# Altium PCB IoT_SYNTHPATCH.PcbDoc (part 1 of 3)
Units mm, origin at the board's own origin, x right, y up, seen from the top; angles counter-clockwise.
Board outline 109 x 108 mm, 6 copper layers (Top Layer, PWR, GND, SIG_MID, GND2, Bottom Layer), stack 1.82 mm thick; 198 components, 158 nets, 695 pads, 418 vias.
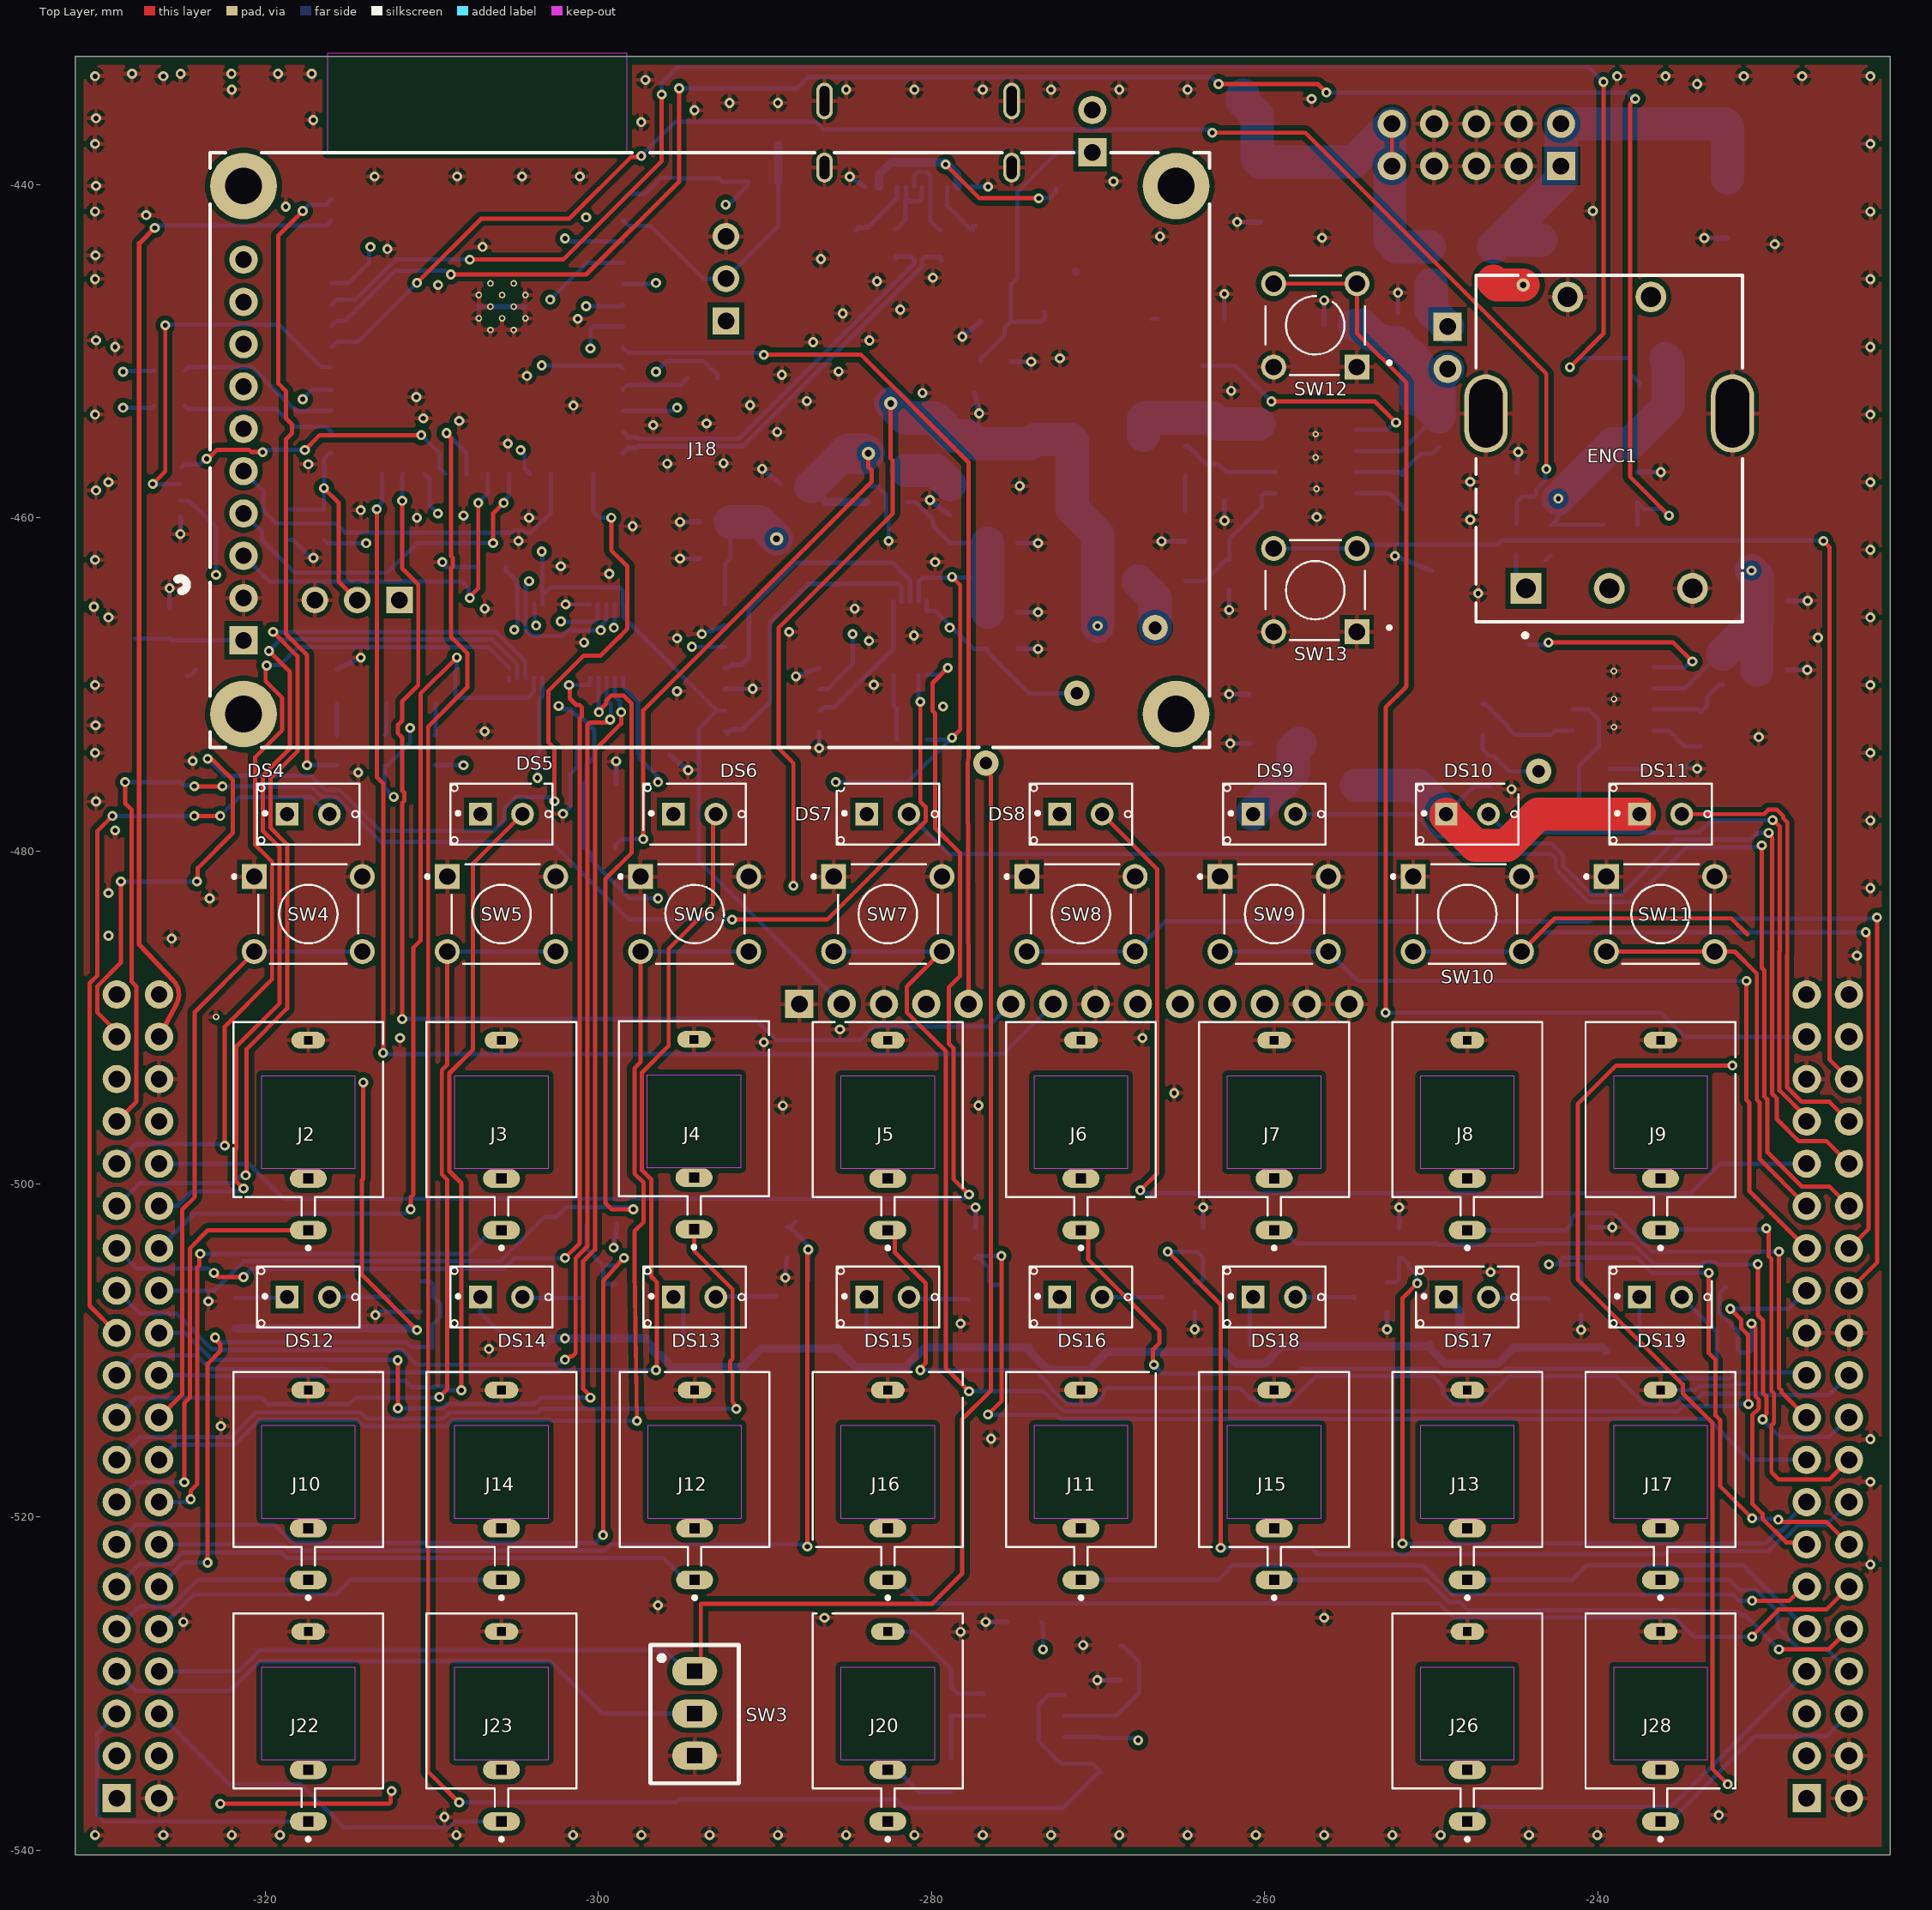
[diagram p0: Top Layer view]
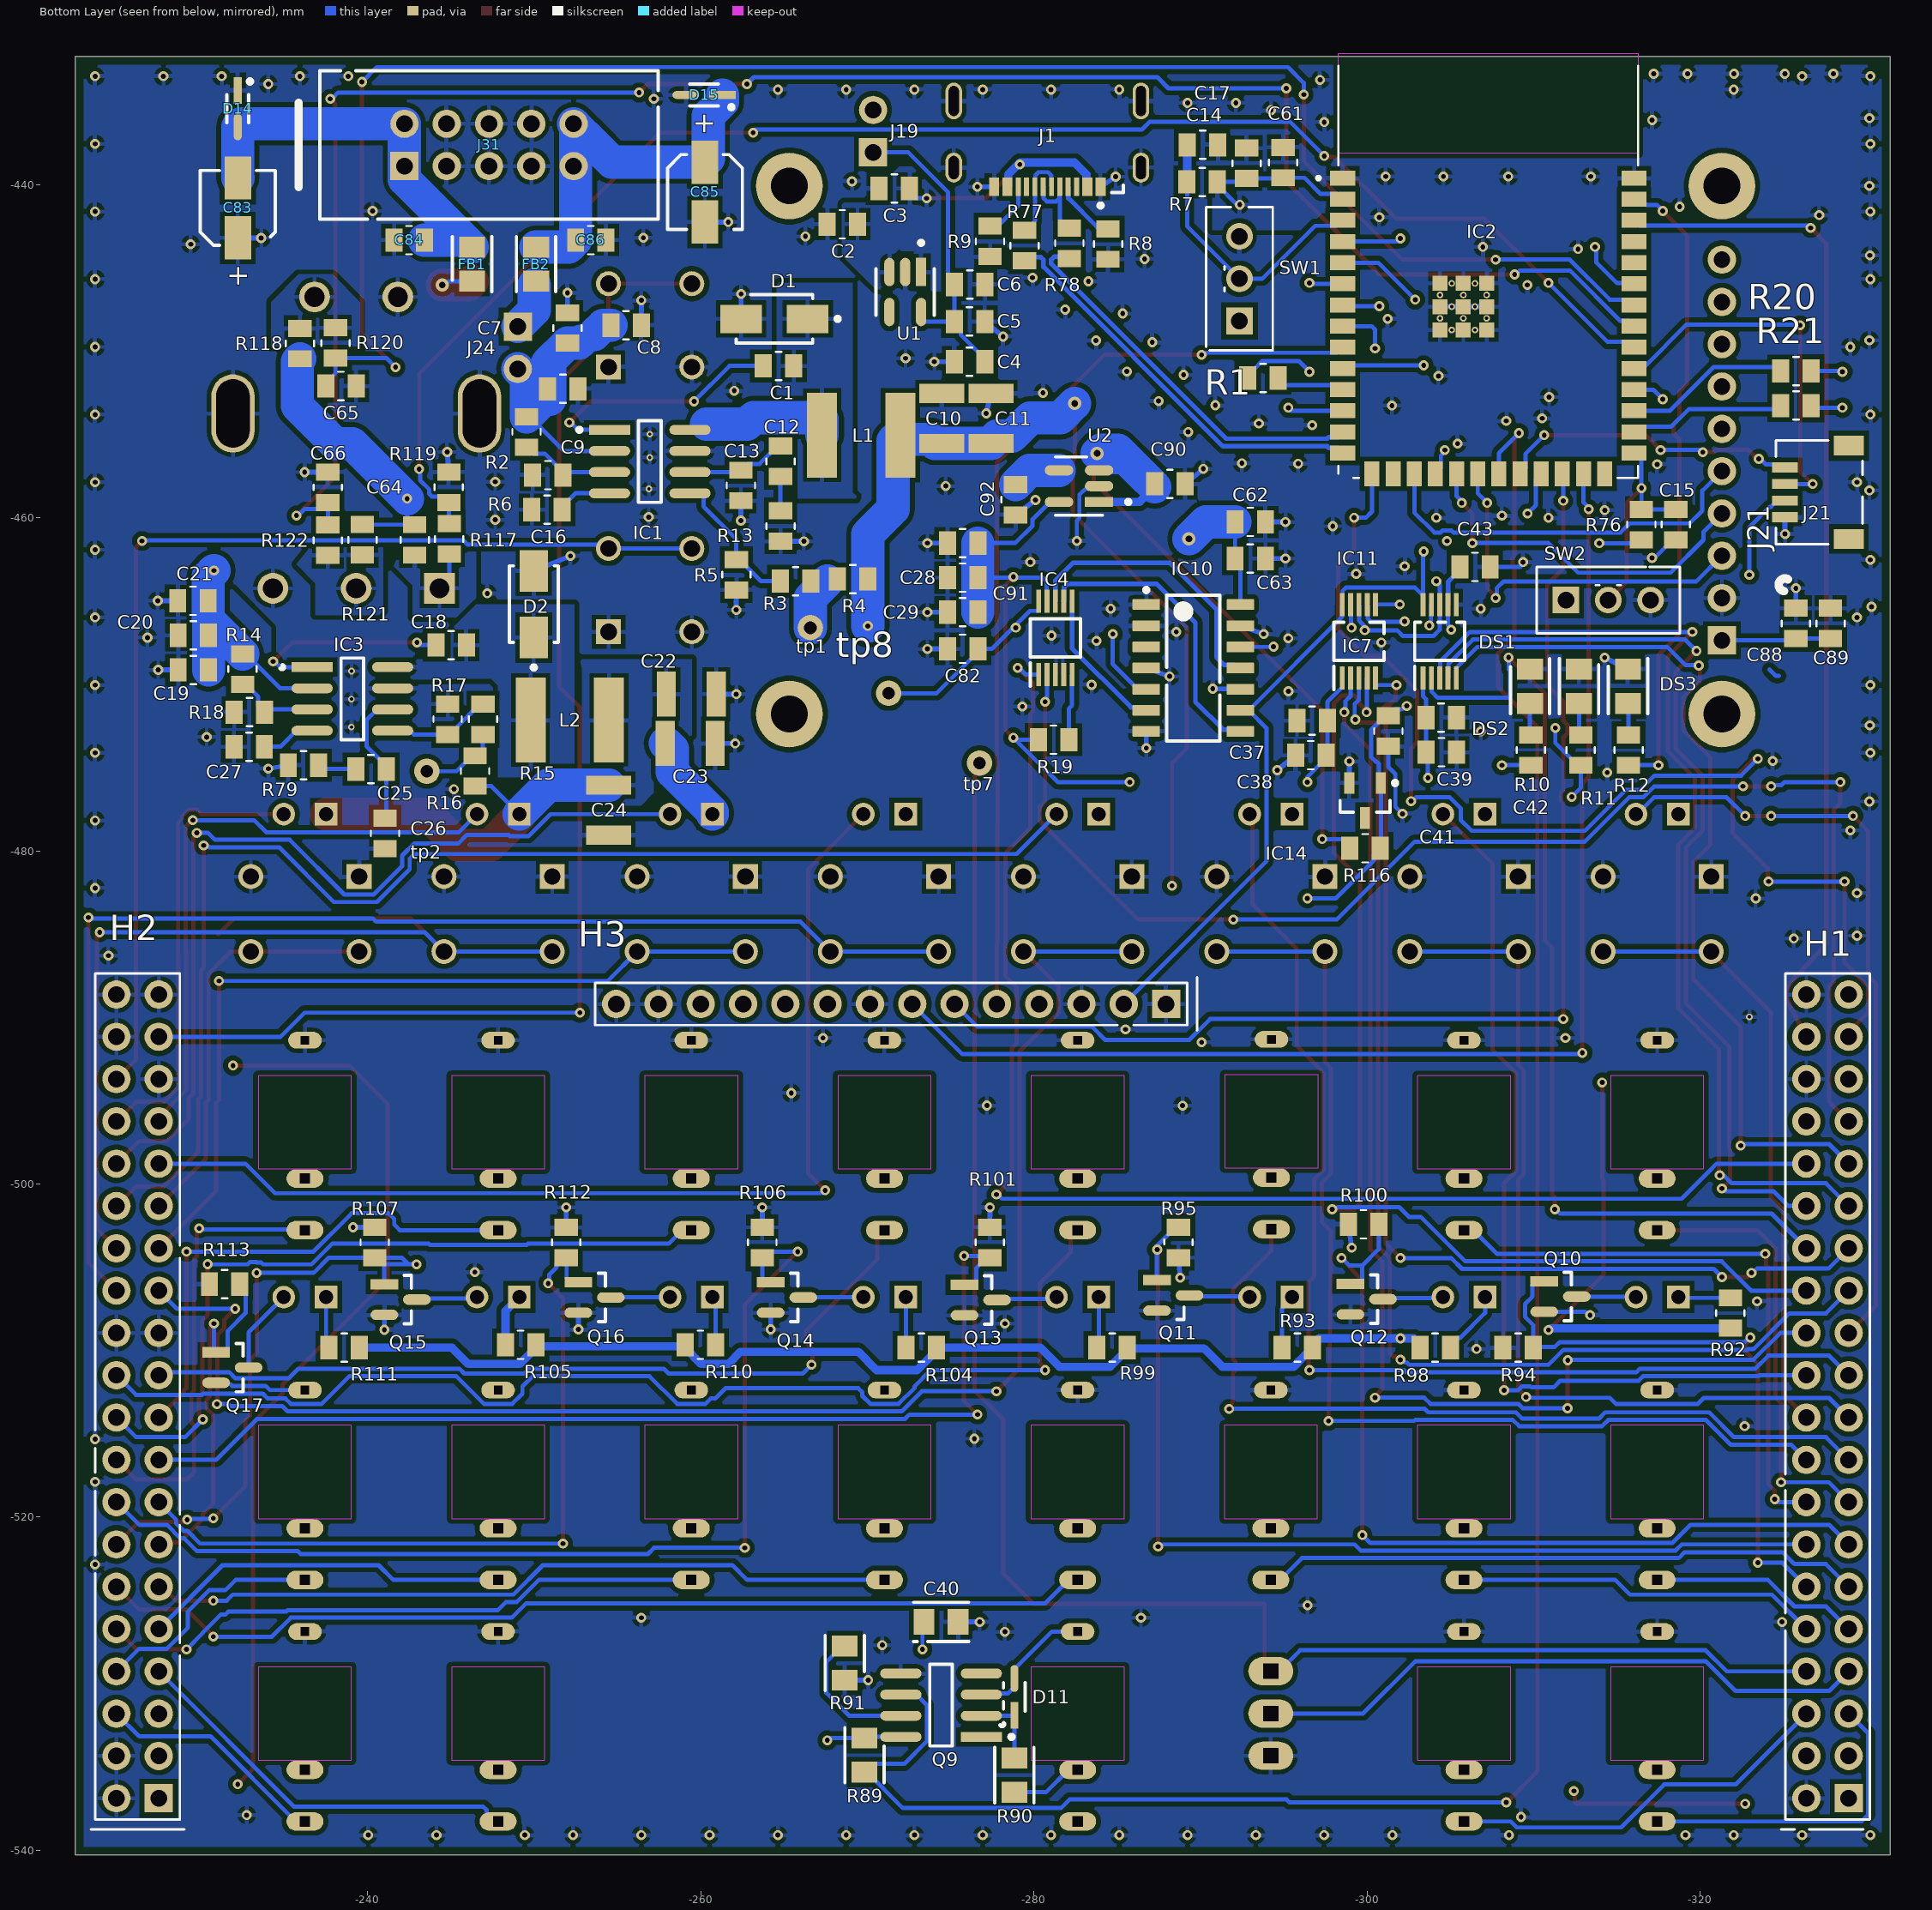
[diagram p1: Bottom Layer view, seen from below]
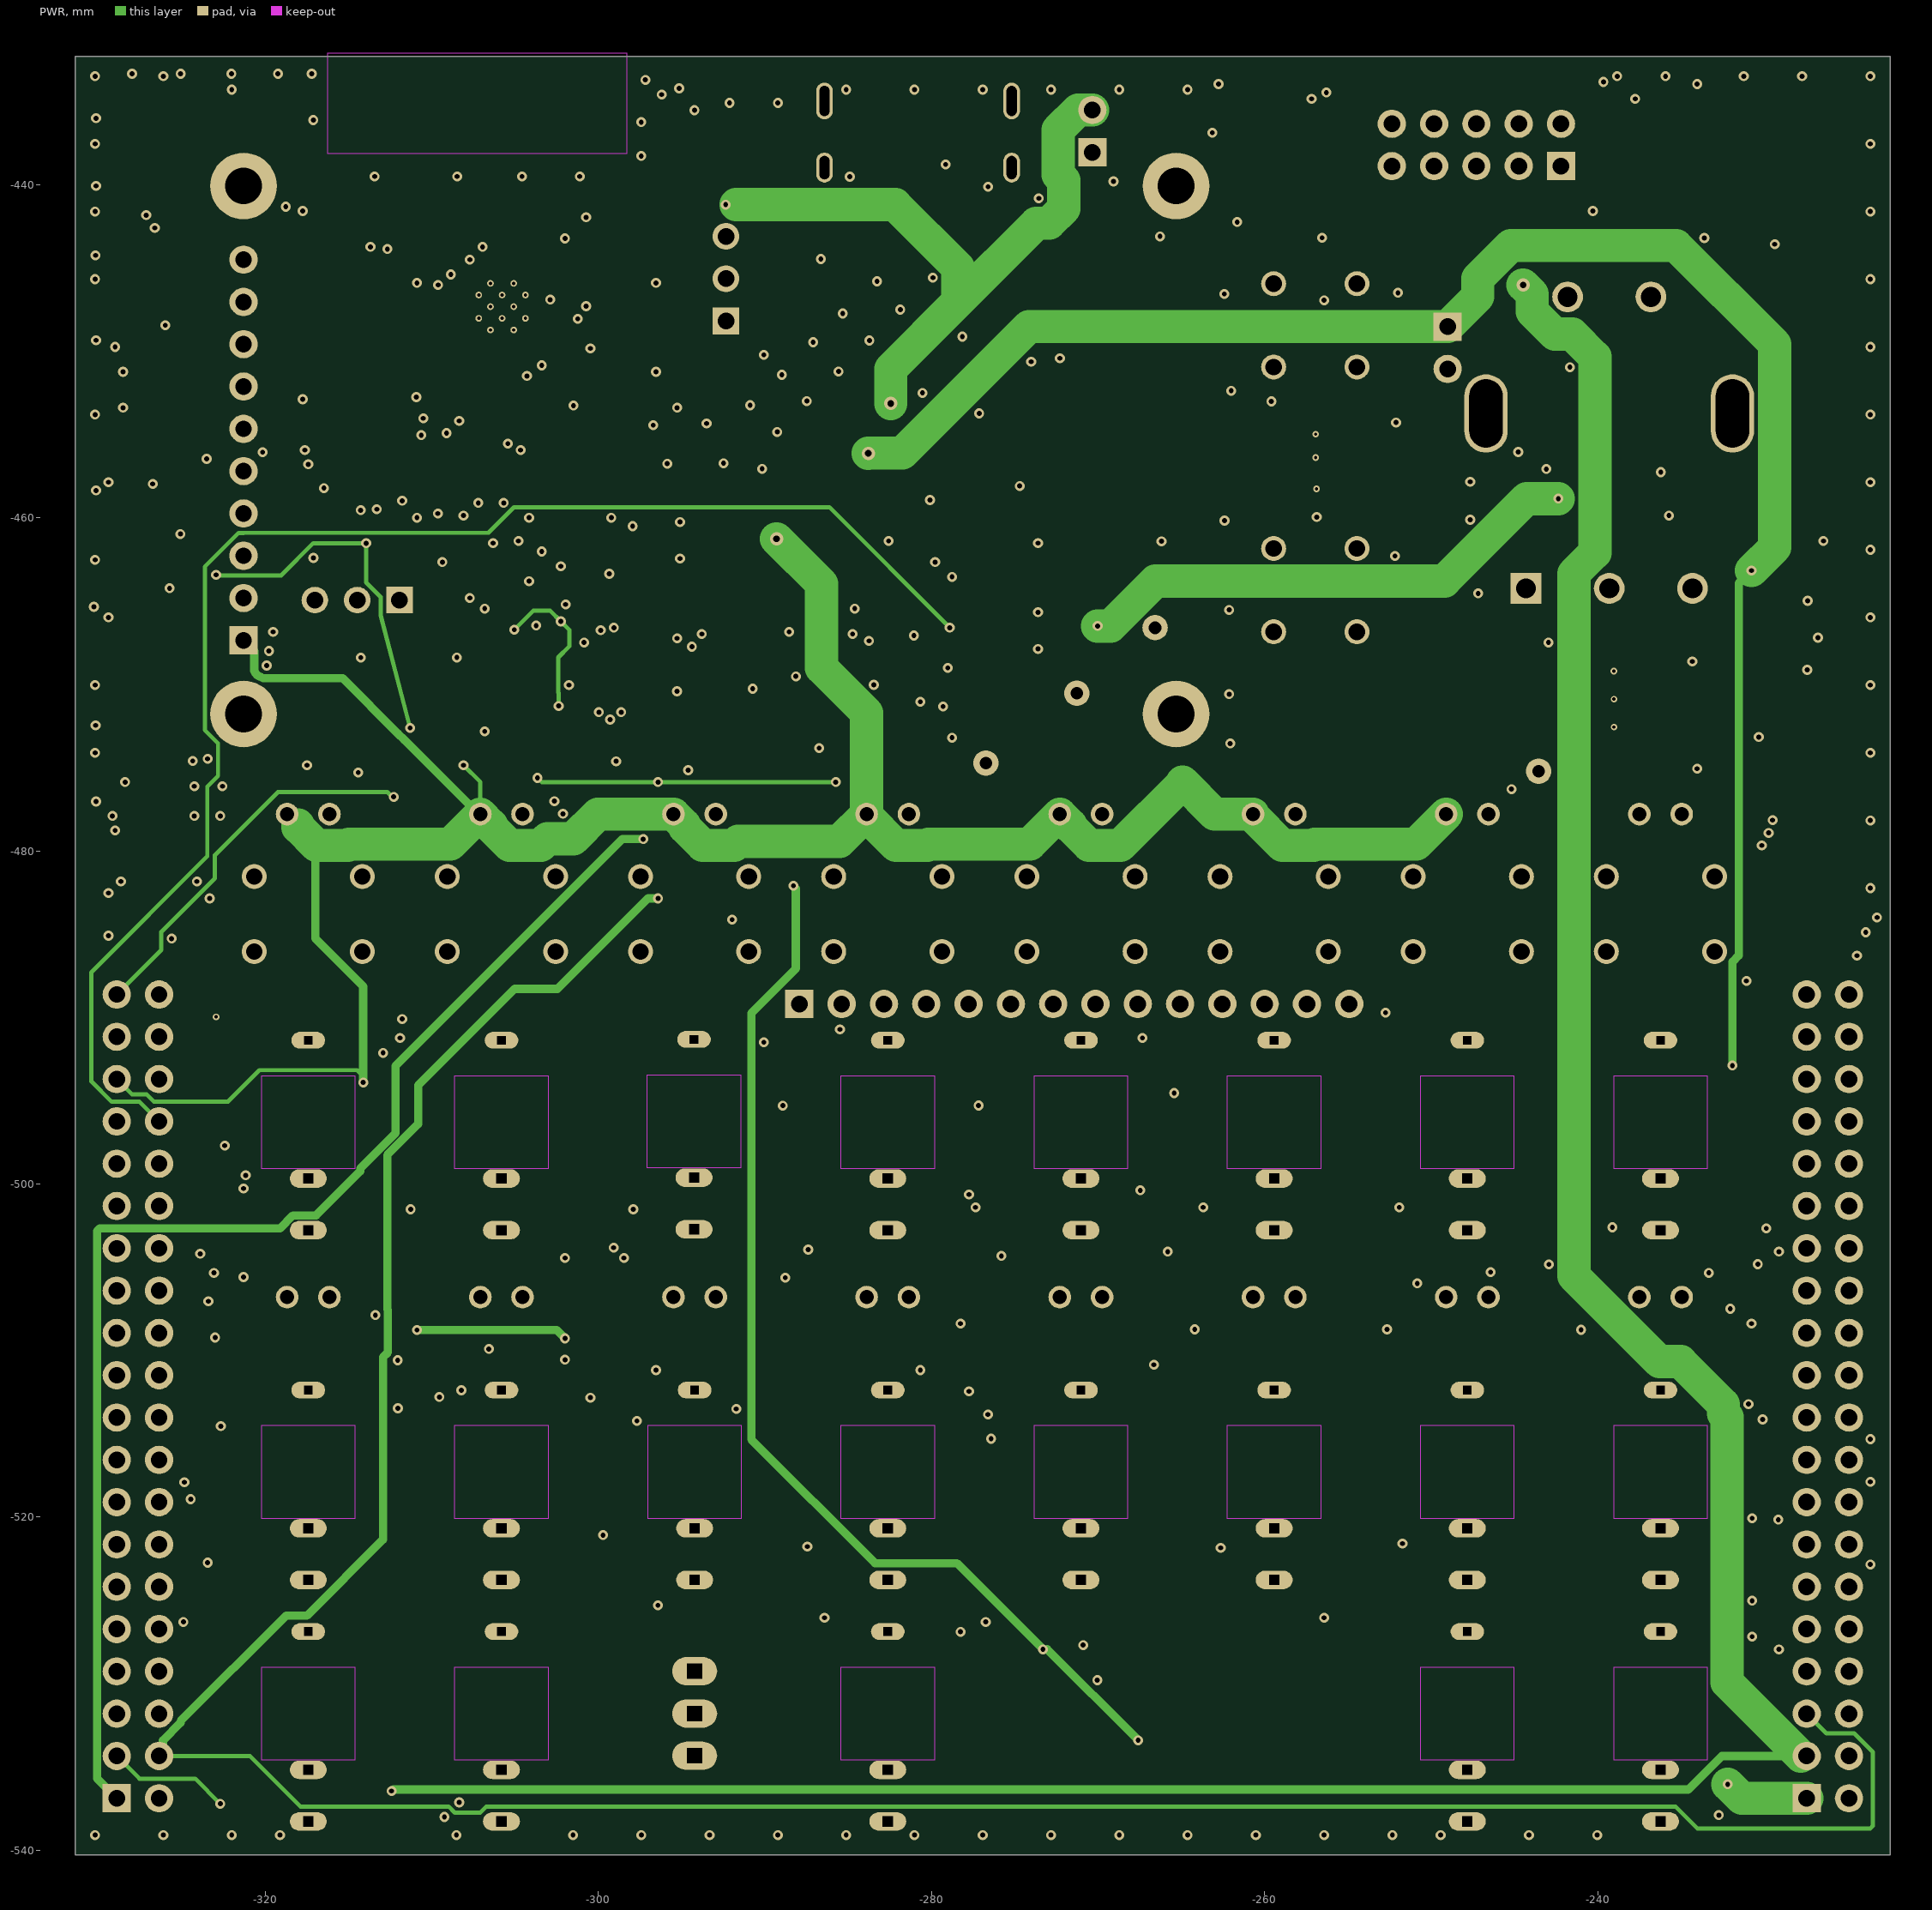
[diagram p2: PWR]
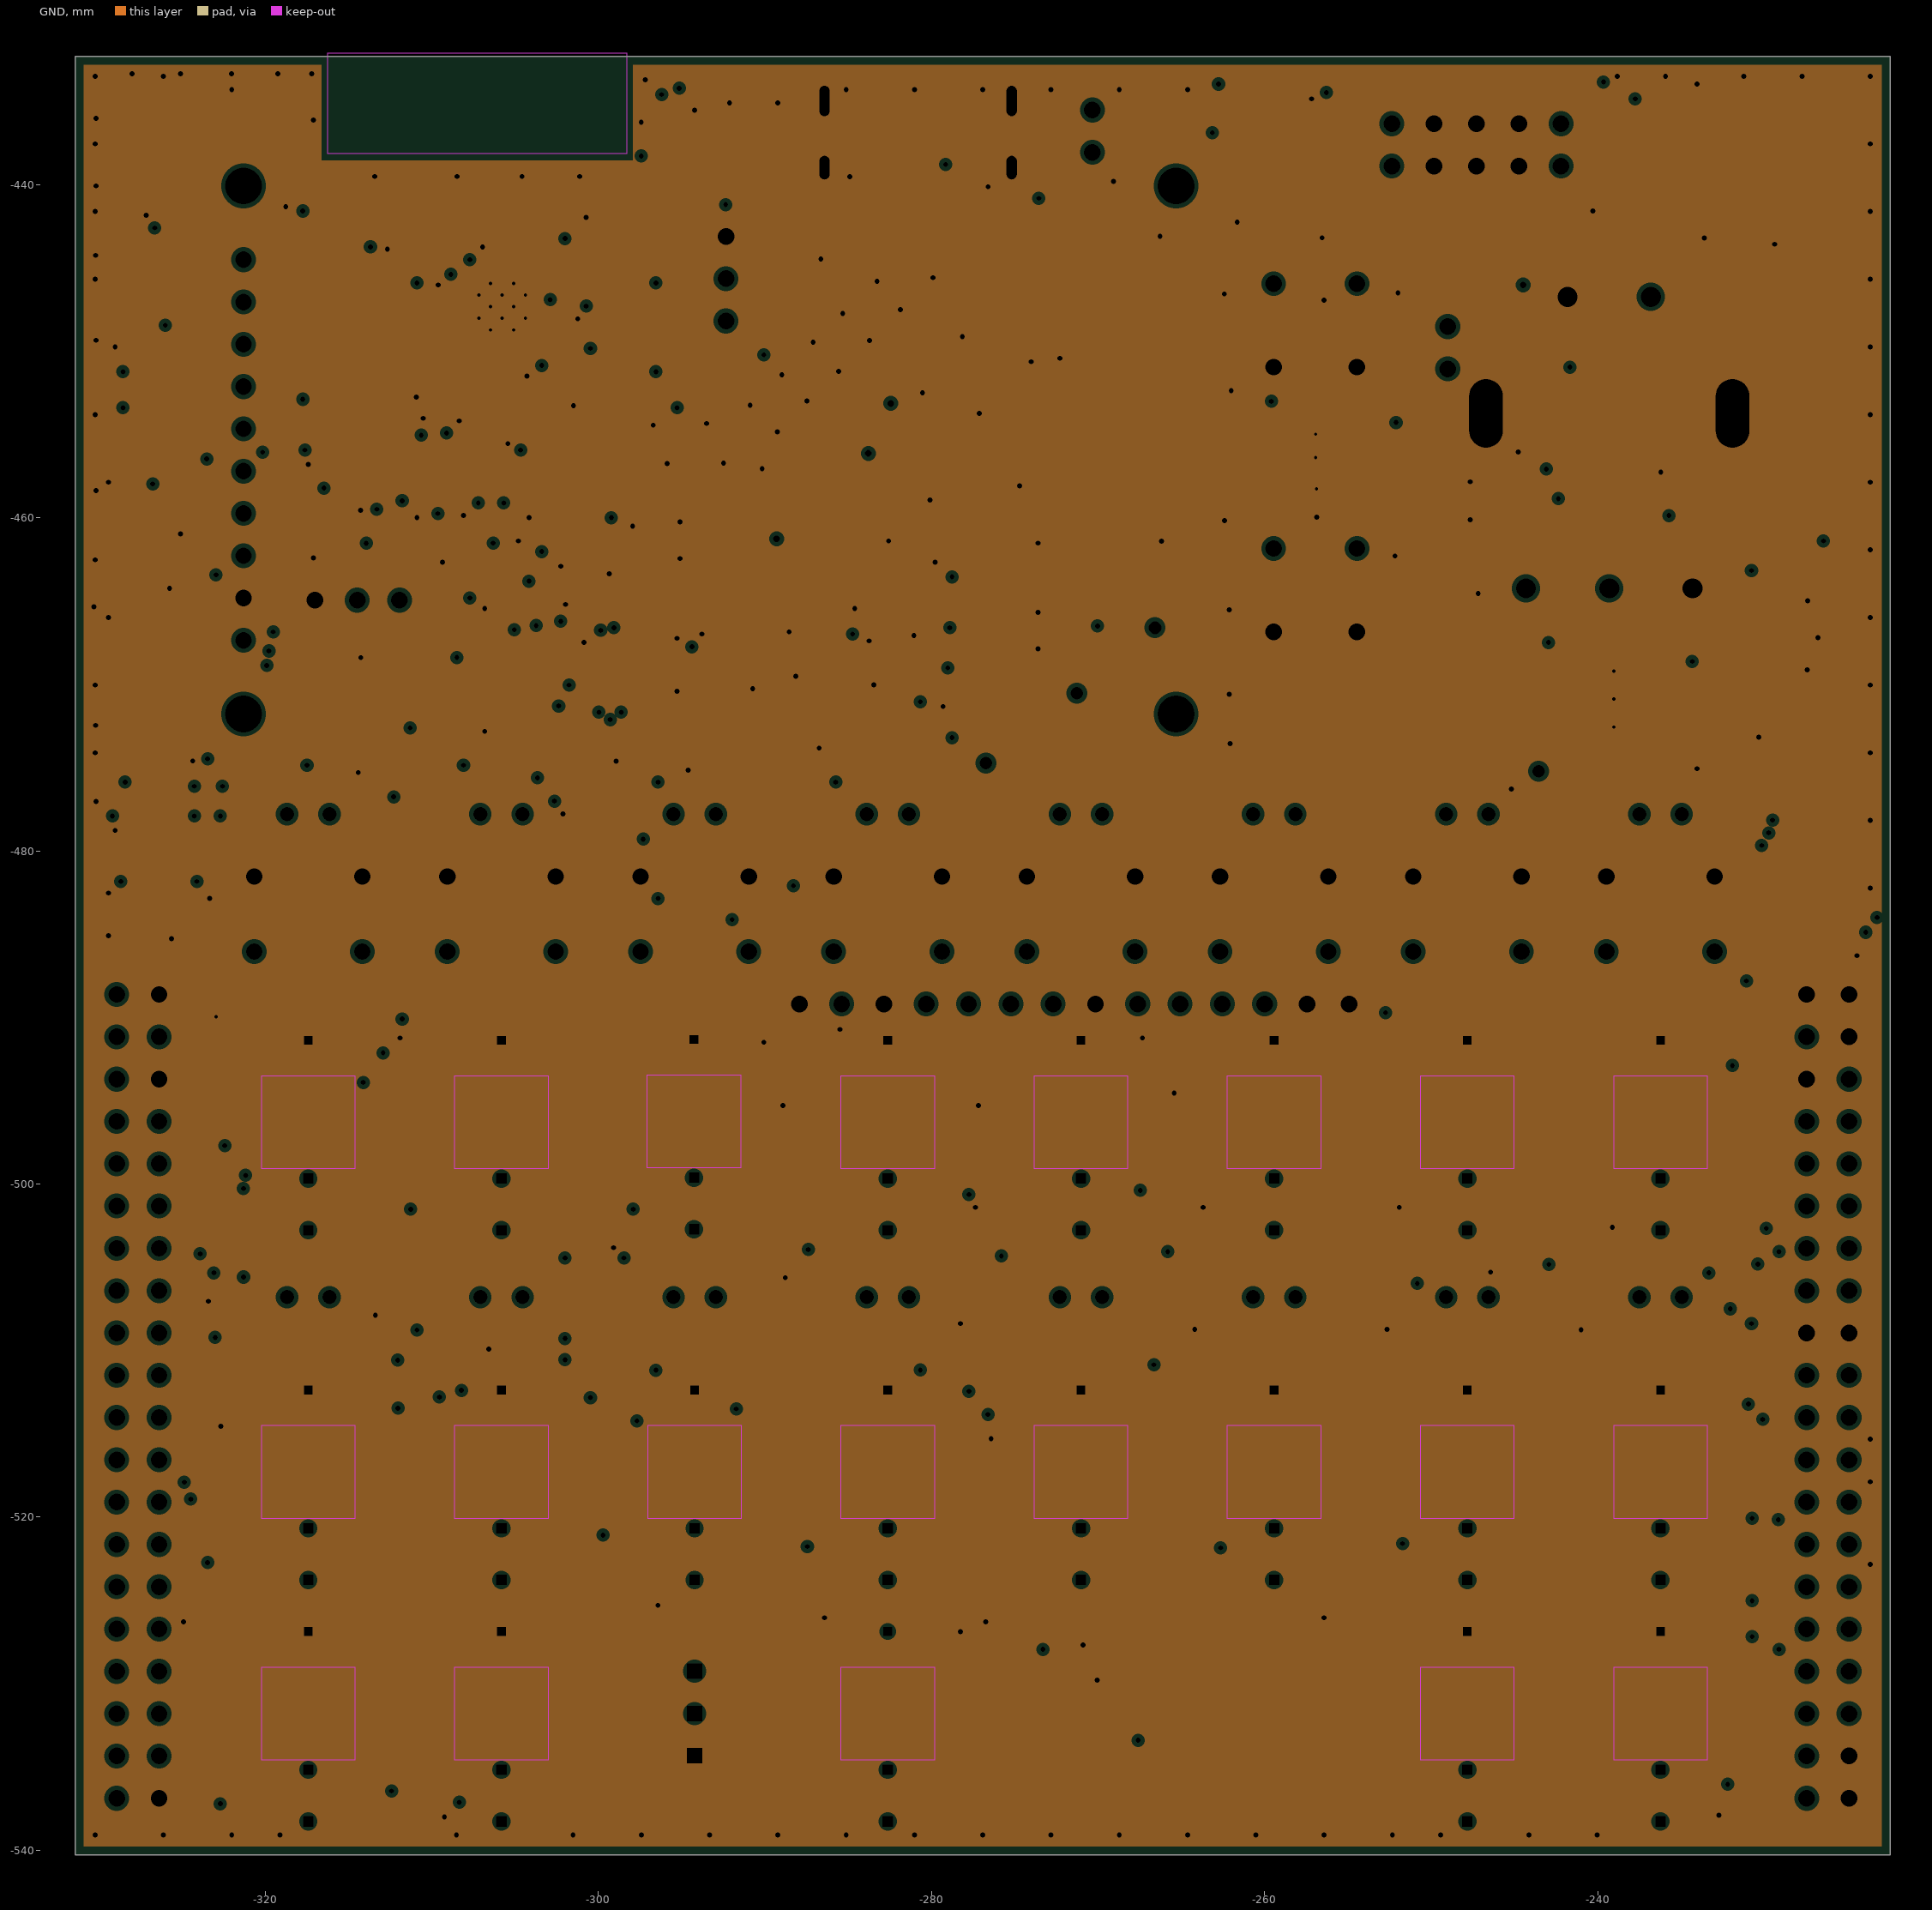
[diagram p3: GND, clearances drawn from the general rule]
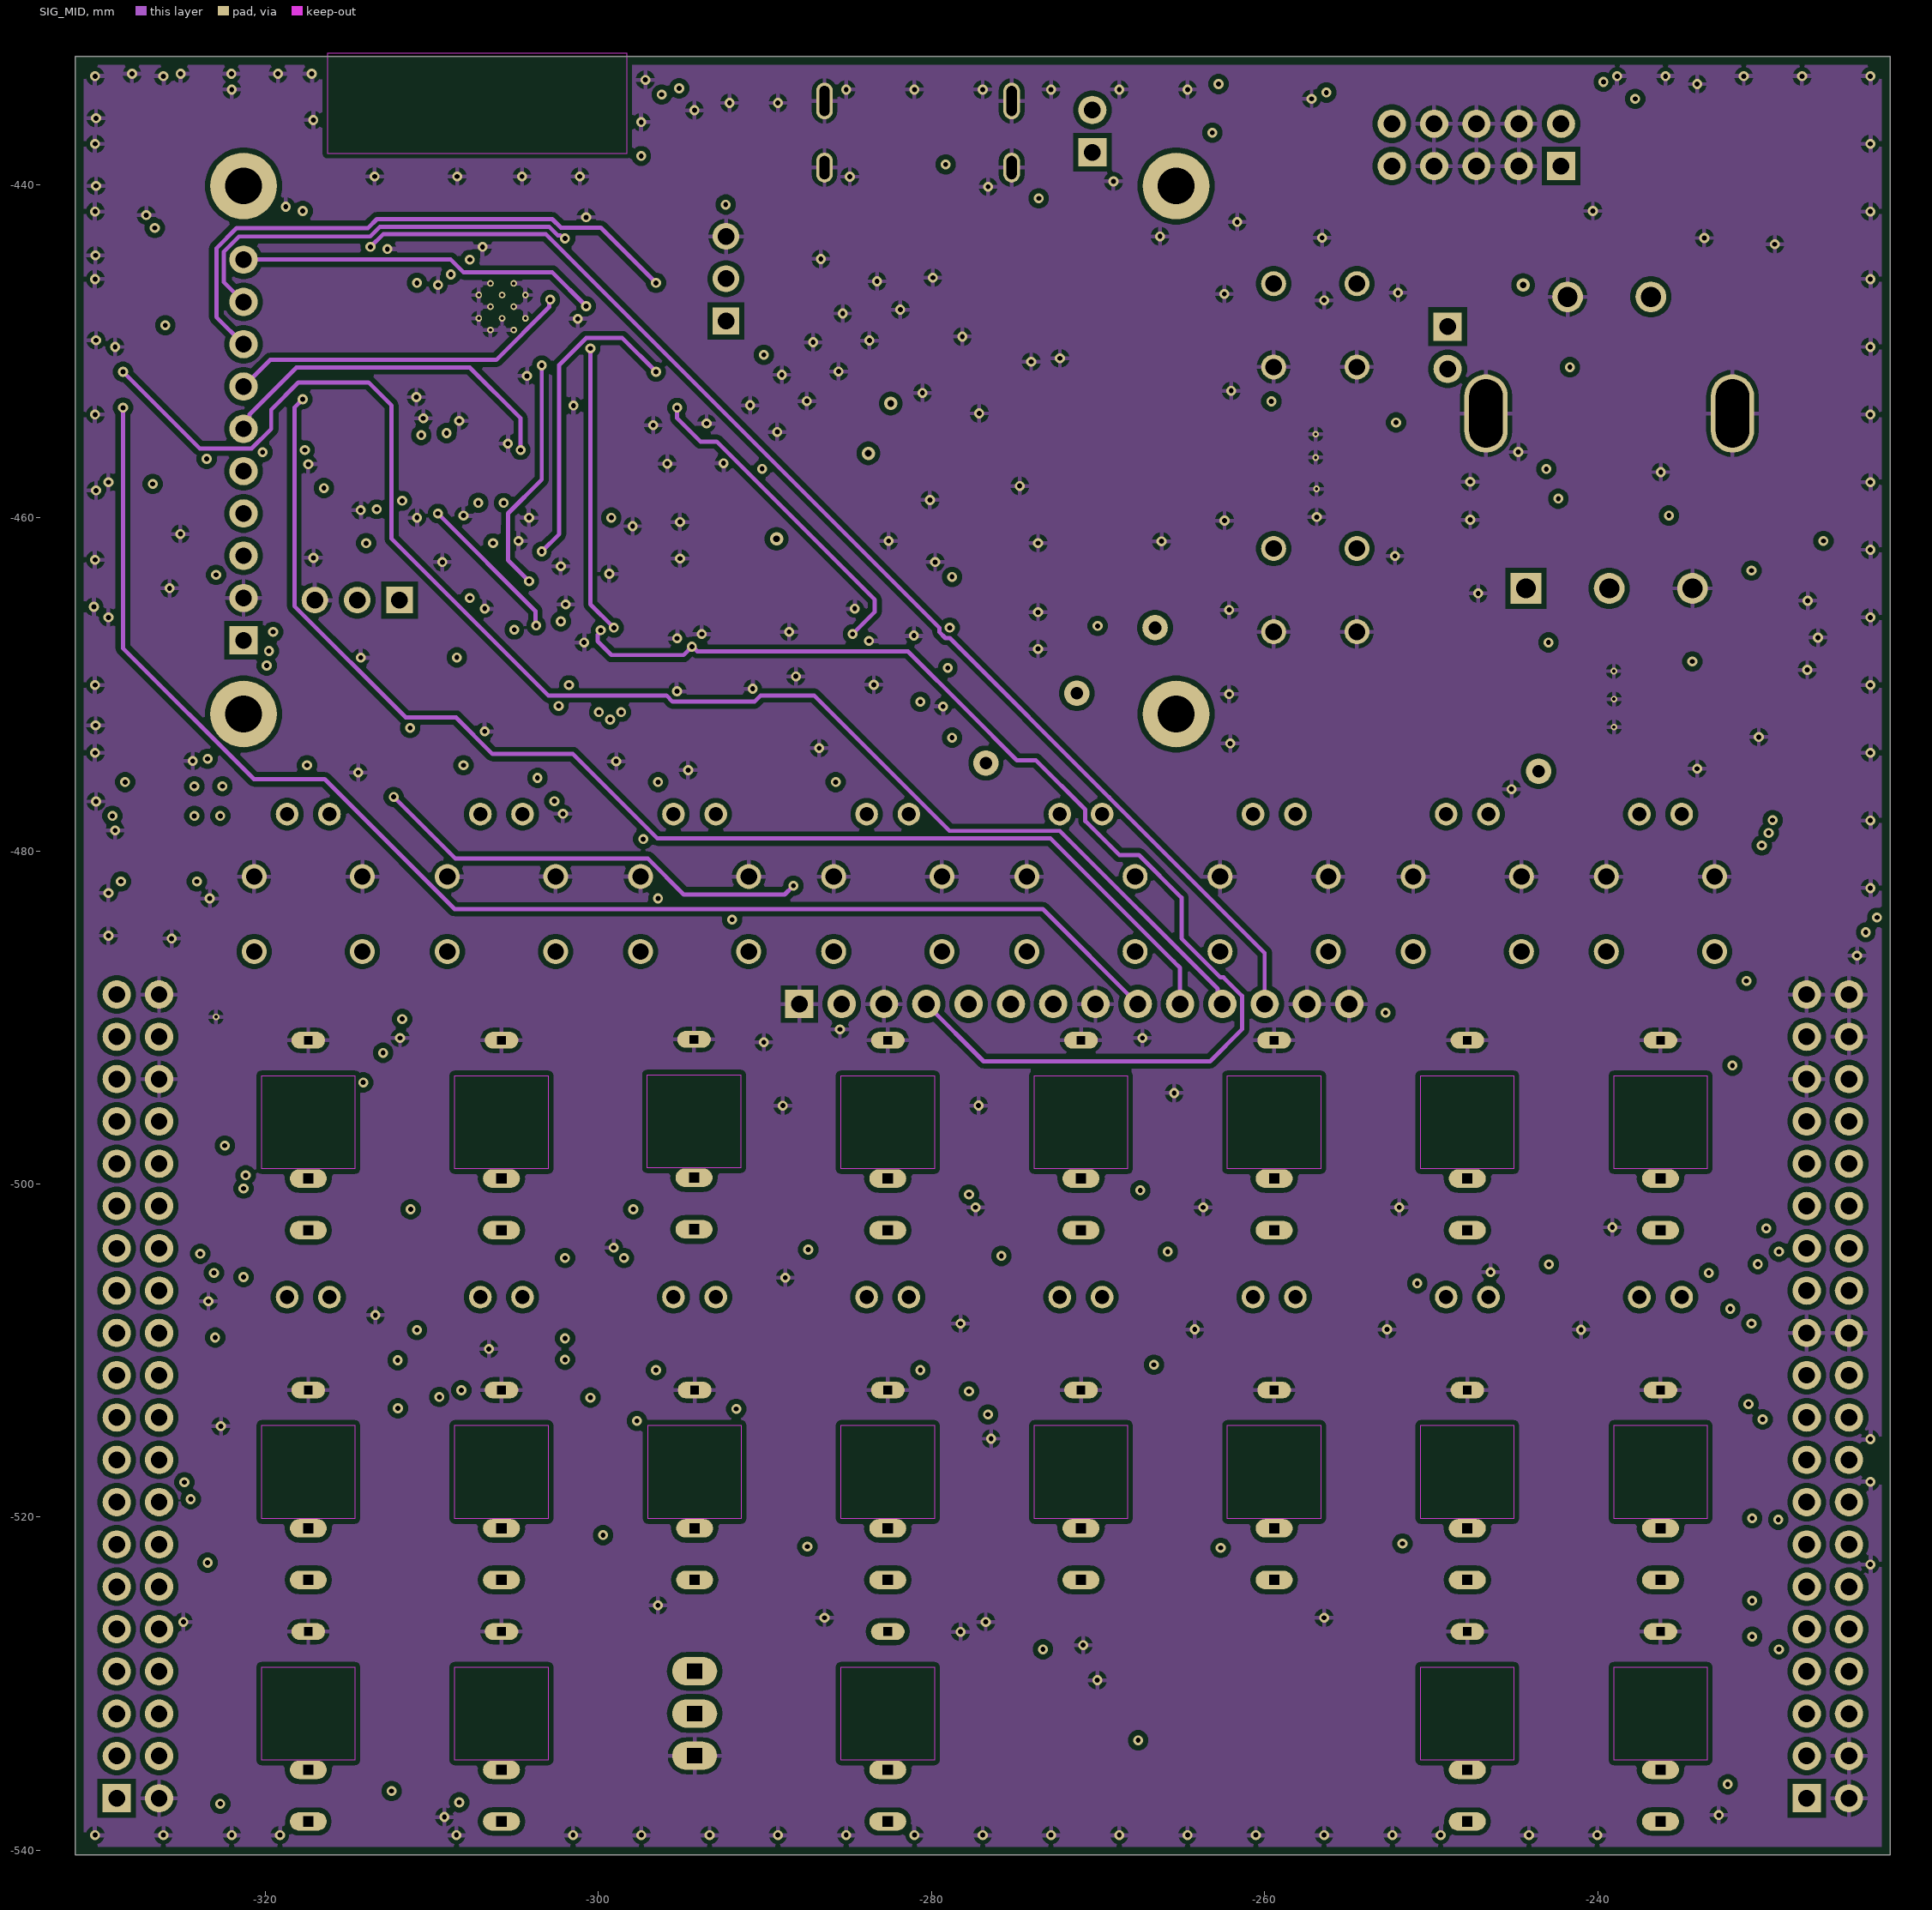
[diagram p4: SIG_MID]
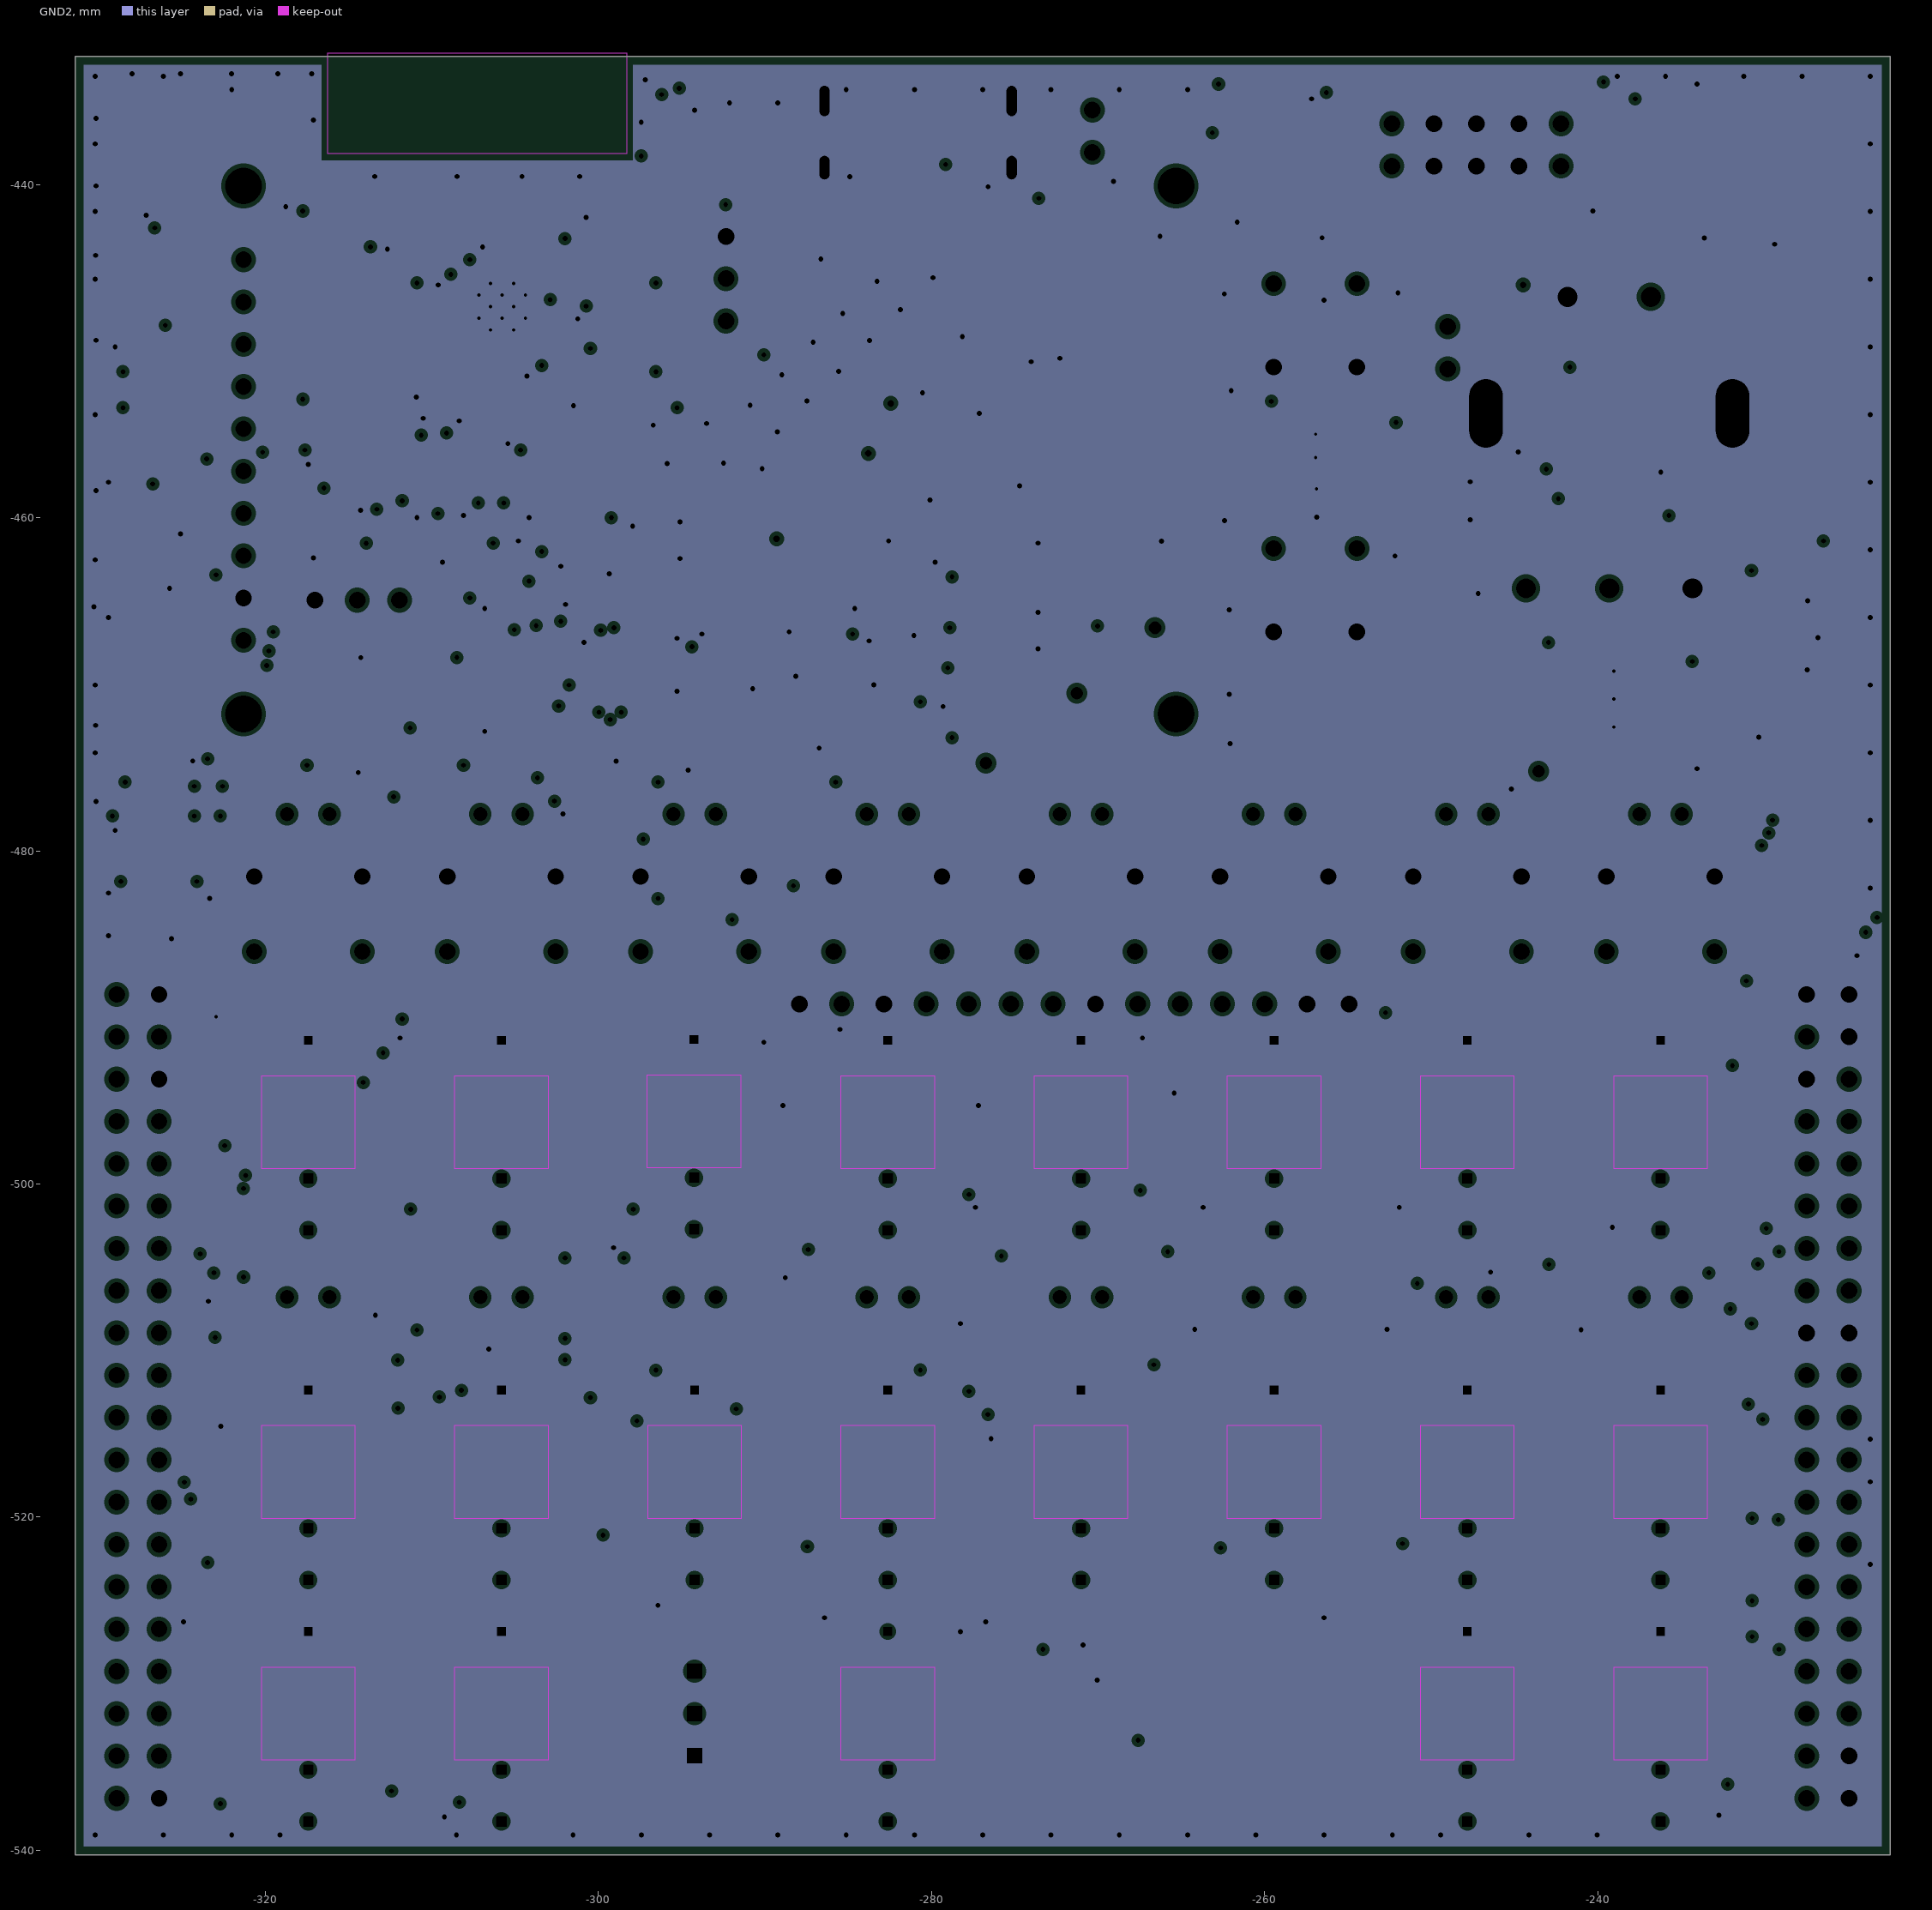
[diagram p5: GND2, clearances drawn from the general rule]
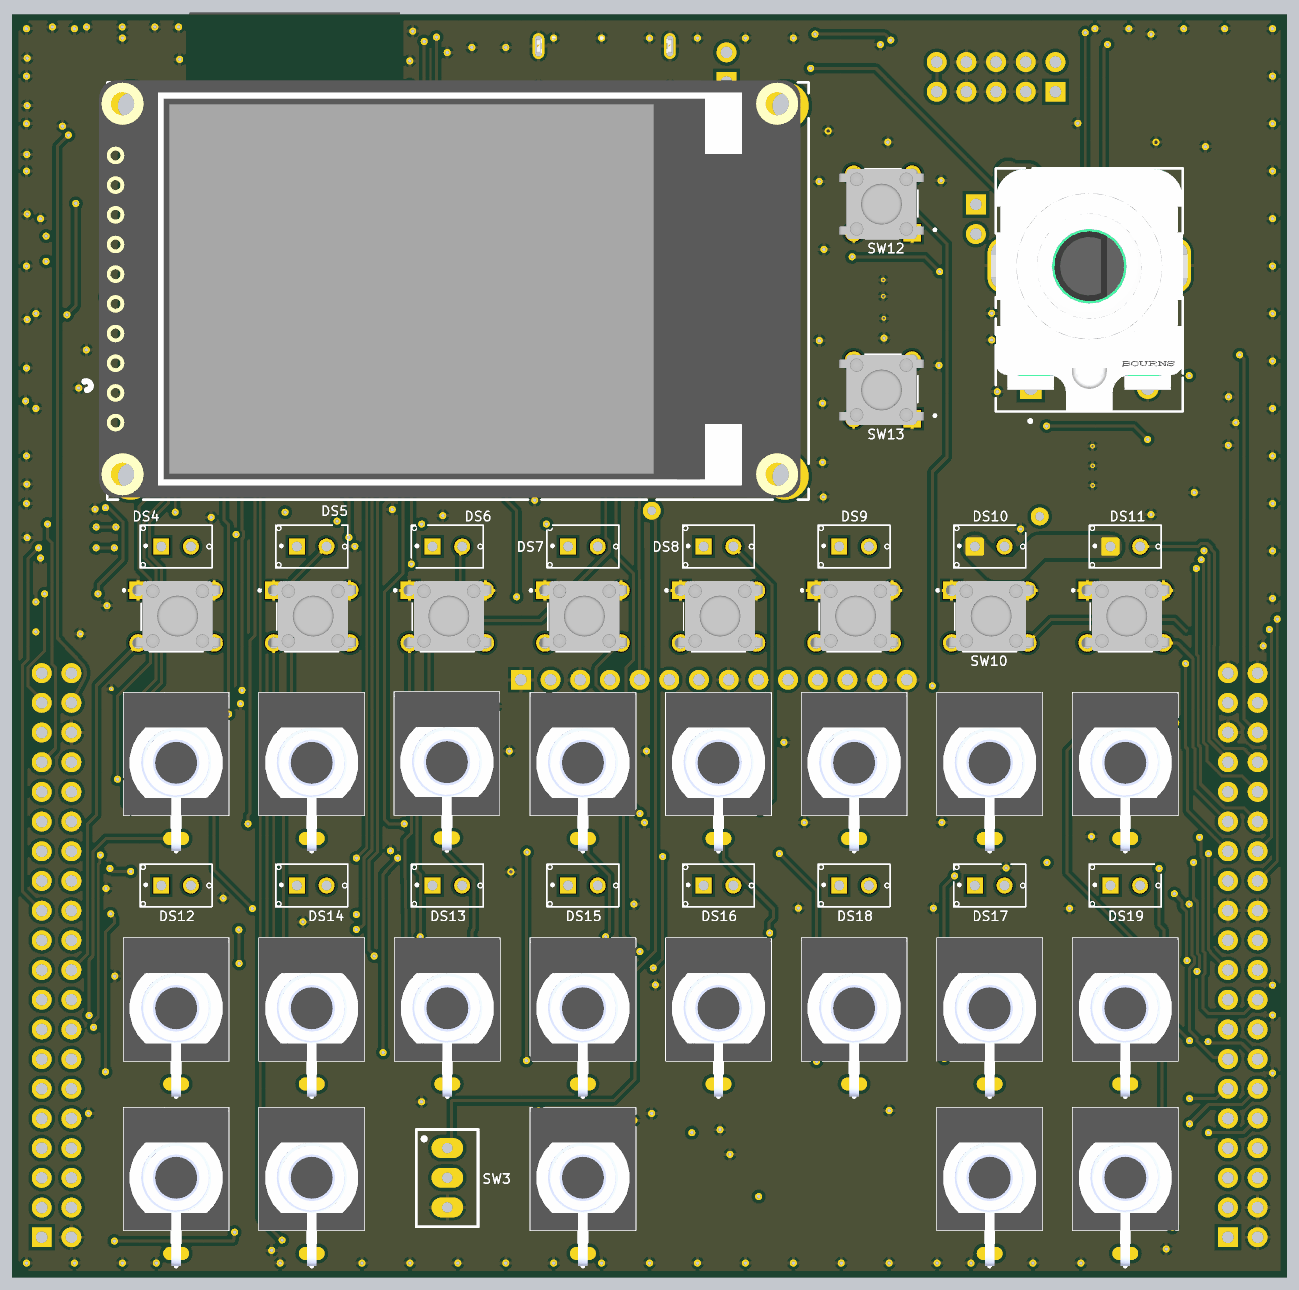
[diagram p8: 3D render of the assembled board from above, using the file's embedded part models]

## Layer stack, top to bottom
Top Solder: solder mask 0.0102, Solder Resist, Dk 3.5
Top Layer: signal copper 0.0356
Dielectric 2: prepreg 0.2104, PP-006, Dk 4.4
PWR: signal copper 0.0356
Dielectric 1: dielectric 1.065, FR-4, Dk 4.6
GND: plane copper 0.0152, net GND
Dielectric 4: prepreg 0.0711, PP-006, Dk 4.1
SIG_MID: signal copper 0.035
Dielectric 5: prepreg 0.0711, PP-006, Dk 4.1
GND2: plane copper 0.035, net GND
Dielectric 3: prepreg 0.2104, PP-006, Dk 4.4
Bottom Layer: signal copper 0.0356
Bottom Solder: solder mask 0.0102, Solder Resist, Dk 3.5

## Board outline
-331.423,-540.291 -222.423,-540.291 -222.423,-432.291 -331.423,-432.291

## Design rules (kind name [scope] priority, off if disabled: settings)
BoardOutlineClearance [All] p1: gap=0.5 ignorepadtopadclearanceinfootprint=FALSE
Clearance Clearance_Polygon [InPolygon] p1: gap=0.3 ignorepadtopadclearanceinfootprint=FALSE
Clearance [All] p2: gap=0.2 ignorepadtopadclearanceinfootprint=FALSE
DiffPairsRouting [All] p1: maxlimit=0.2 minlimit=0.16 mostfreqgap=0.18 toplayer_minwidth=0.28 toplayer_maxwidth=0.32 toplayer_prefwidth=0.3 midlayer1_minwidth=0.28 midlayer1_maxwidth=0.32 midlayer1_prefwidth=0.3 midlayer2_minwidth=0.28 midlayer2_maxwidth=0.32 midlayer2_prefwidth=0.3 bottomlayer_minwidth=0.28 bottomlayer_maxwidth=0.32 bottomlayer_prefwidth=0.3 maxuncoupledlength=12.7
HoleToHoleClearance [All] p1: gap=0.5 allowstackedmicrovias=TRUE
MinimumSolderMaskSliver [All] p1: minsoldermaskwidth=0.1
PlaneClearance [All] p1: clearance=0.25
PlaneConnect [All] p1: planeconnectstyle=Relief reliefexpansion=0.508 reliefentries=4 reliefconductorwidth=0.254 reliefairgap=0.254
PolygonConnect [All] p1: connectstyle=Relief reliefconductorwidth=0.254 reliefentries=4 polygonreliefangle="90 Angle" airgapwidth=0.254
RoutingVias [All] p1: holewidth=0.3 width=0.6 viastyle="Through Hole" minholewidth=0.3 minwidth=0.6 maxholewidth=0.711 maxwidth=1.27
SilkToSolderMaskClearance [IsPad] p1: minsilkscreentomaskgap=0.15 clearancetoexposedcopper=TRUE
SolderMaskExpansion [All] p1: expansion=0 istentingtop=FALSE
SupplyNets "Schematic Supply Nets_7" [InNet('+5A')] p1: voltage=0.000
SupplyNets "Schematic Supply Nets_6" [InNet('+5_USB')] p2: voltage=0.000
SupplyNets "Schematic Supply Nets_5" [InNet('+3.3')] p3: voltage=0.000
SupplyNets "Schematic Supply Nets_4" [InNet('GND')] p4: voltage=0.000
SupplyNets "Schematic Supply Nets_3" [InNet('+5')] p5: voltage=0.000
SupplyNets "Schematic Supply Nets_2" [InNet('-12')] p6: voltage=0.000
SupplyNets "Schematic Supply Nets" [InNet('+12')] p7: voltage=0.000
Width Width_PWR_LV [InNetClass('PWR_LV')] p1: maxlimit=2 minlimit=0.3 preferedwidth=0.5
Width Width_PWR_IN [InNetClass('PWR_IN')] p2: maxlimit=2 minlimit=0.4 preferedwidth=0.8
Width [All] p3: maxlimit=2 minlimit=0.15 preferedwidth=0.254
24 further rules are at their usual default settings.

## Classes and differential pairs
component class CONNECTORS: H1 H2 H3
component class MENU_BUTTONS: SW12 SW13
component class POWER_CONNECTOR: C83 C84 C85 C86 D14 D15 FB1 FB2 J31
component class POWER: C1 C2 C3 C4 C5 C6 C7 C8 C9 C10 C11 C12 C13 C16 C18 C19 C20 C21 C22 C23 C24 C25 C26 C27 D1 D2 IC1 IC3 J19 J24 L1 L2 R2 R3 R4 R5 R6 R13 R14 R15 R16 R17 R18 R79 tp1 tp2 U1
component class MUTE_BUTTONS: DS4 DS5 DS6 DS7 DS8 DS9 DS10 DS11 SW4 SW5 SW6 SW7 SW8 SW9 SW10 SW11
component class MIDI: C40 D11 J20 J21 Q9 R89 R90 R91
component class Main: C14 C15 C17 C61 DS1 DS2 DS3 IC2 J1 R1 R7 R8 R9 R10 R11 R12 R20 R21 R76 R77 R78 SW1 SW2
component class INPUTS_GATES: J2 J3 J4 J5 J6 J7 J8 J9
component class DISPLAY: C64 C65 C66 C88 C89 ENC1 J18 R117 R118 R119 R120 R121 R122
component class DAC_VOCT: C28 C29 C62 C63 C82 IC4 IC10 J22 J23 R19 SW3 tp7 tp8
component class DAC_LFO: C37 C38 C39 C41 C42 C43 C90 C91 C92 DS12 DS13 DS14 DS15 DS16 DS17 DS18 DS19 IC7 IC11 IC14 J10 J11 J12 J13 J14 J15 J16 J17 Q10 Q11 Q12 Q13 Q14 Q15 Q16 Q17 R92 R93 R94 R95 R98 R99 R100 R101 R104 R105 R106 R107 R110 R111 R112 R113 R116 U2
component class ADC: J26 J28
differential pair D: +D_P -D_N

## Components (designator, comment, footprint, x,y, rotation, side; value= is the part's Value field where it differs from the comment)
C1 "0.1uF" CAPC2013X145X48NL20T23 -264.663,-450.88 r180 bottom
C2 "1uF" CAPC2013X145X48NL20T23 -268.491,-442.374 r180 bottom
C3 "10uF" CAPC2013X145X48NL20T23 -271.613,-440.233 r180 bottom
C4 "1uF" CAPC2013X145X48NL20T23 -276.131,-450.629 r180 bottom
C5 "10uF" CAPC2013X145X48NL20T23 -276.131,-448.216 r0 bottom
C6 "0.1uF" CAPC2013X145X48NL20T23 -276.143,-445.992 r0 bottom
C7 "4.7uF" CAPC2013X145X48NL20T23 -251.986,-448.605 r270 bottom
C8 "4.7uF" CAPC2013X145X48NL20T23 -255.506,-448.445 r0 bottom
C9 "0.01uF" CAPC2013X145X48NL20T23 -251.712,-452.258 r0 bottom
C10 "47uF" CAP_1210 -274.475,-454.03 r270 bottom
C11 "47uF" CAP_1210 -277.43,-454.03 r270 bottom
C12 "1nF" CAPC2013X145X48NL20T23 -264.78,-456.606 r90 bottom
C13 "47pF" CAPC2013X145X48NL20T23 -262.4,-458.058 r90 bottom
C14 "1uF" CAPC2013X145X48NL20T23 -290.123,-437.61 r180 bottom
C15 "0.1uF" CAPC2013X145X48NL20T23 -318.54,-460.405 r90 bottom
C16 "0.01uF" CAPC2013X145X48NL20T23 -250.757,-459.51 r180 bottom
C17 "0.1uF" CAPC2013X145X48NL20T23 -292.768,-438.714 r270 bottom
C18 "0.1uF" CAPC2013X145X48NL20T23 -245.004,-467.642 r180 bottom
C19 "4.7uF" CAPC2013X145X48NL20T23 -229.522,-469.134 r180 bottom
C20 "4.7uF" CAPC2013X145X48NL20T23 -229.522,-467.06 r180 bottom
C21 "0.01uF" CAPC2013X145X48NL20T23 -229.497,-464.98 r180 bottom
C22 "47uF" CAP_1210 -259.418,-470.593 r0 bottom
C23 "47uF" CAP_1210 -259.36,-473.547 r0 bottom
C24 "47uF" CAP_1210 -254.465,-477.553 r90 bottom
C25 "1nF" CAPC2013X145X48NL20T23 -240.187,-475.087 r180 bottom
C26 "47pF" CAPC2013X145X48NL20T23 -241.032,-478.953 r90 bottom
C27 "0.01uF" CAPC2013X145X48NL20T23 -232.873,-473.746 r180 bottom
C28 "0.1uF" CAPC2013X145X48NL20T23 -275.717,-463.592 r180 bottom
C29 "10uF" CAPC2013X145X48NL20T23 -275.717,-465.667 r180 bottom
C37 "10uF" CAPC2013X145X48NL20T23 -296.707,-472.177 r180 bottom
C38 "0.1uF" CAPC2013X145X48NL20T23 -296.628,-474.251 r180 bottom
C39 "0.1uF" CAPC2013X145X48NL20T23 -301.277,-472.803 r90 bottom
C40 "0.1uF" 0805-HS -274.423,-526.291 r0 bottom
C41 "10uF" CAPC2013X145X48NL20T23 -304.463,-474.074 r0 bottom
C42 "0.1uF" CAPC2013X145X48NL20T23 -304.451,-472 r0 bottom
C43 "0.1uF" CAPC2013X145X48NL20T23 -306.484,-462.948 r0 bottom
C61 "10uF" CAPC2013X145X48NL20T23 -294.958,-438.673 r270 bottom
C62 "10uF" CAPC2013X145X48NL20T23 -292.989,-460.248 r0 bottom
C63 "0.1uF" CAPC2013X145X48NL20T23 -292.989,-462.449 r0 bottom
C64 "10nF" CAPC2013X145X48NL20T23 -244.862,-458.168 r270 bottom
C65 "0.1uF" CAPC2013X145X48NL20T23 -238.39,-452.088 r0 bottom
C66 "10nF" CAPC2013X145X48NL20T23 -237.599,-458.173 r270 bottom
C82 "0.15uF" CAPC2013X145X48NL20T23 -275.717,-467.868 r0 bottom
C83 "47uF" WCAP-ASLI_D4H5.5 -232.193,-441.397 r270 bottom
C84 "0.1uF" CAPC2013X145X48NL20T23 -242.484,-443.327 r180 bottom
C85 "47uF" WCAP-ASLI_D4H5.5 -260.241,-440.446 r90 bottom
C86 "0.1uF" CAPC2013X145X48NL20T23 -253.388,-443.327 r180 bottom
C88 "0.1uF" CAPC2013X145X48NL20T23 -325.755,-466.344 r270 bottom
C89 "10uF" CAPC2013X145X48NL20T23 -327.829,-466.344 r270 bottom
C90 "1uF" CAPC2013X145X48NL20T23 -288.163,-457.962 r0 bottom
C91 "4.7uF" CAPC2013X145X48NL20T23 -275.717,-461.518 r180 bottom
C92 "10nF" CAPC2013X145X48NL20T23 -278.89,-458.916 r90 bottom
D1 "B340A-13-F" FP-SMA-MFG -264.414,-448.056 r0 bottom
D2 "B340A-13-F" FP-SMA-MFG -249.964,-465.187 r90 bottom
D11 "1N4148WS" 4148 -278.823,-530.791 r90 bottom
D14 "1N4148WS" 4148 -232.187,-435.44 r270 bottom
D15 "1N4148WS" 4148 -260.194,-434.612 r0 bottom
DS1 "LED" LED_0805 -309.786,-470.116 r90 bottom
DS2 "LED" LED_0805 -312.727,-470.116 r90 bottom
DS3 "LED" LED_0805 -315.669,-470.116 r90 bottom
DS4 "LED" LED_SSL-LX4673GD-LA20 -317.423,-477.791 r0 top
DS5 "LED" LED_SSL-LX4673GD-LA20 -305.823,-477.791 r0 top
DS6 "LED" LED_SSL-LX4673GD-LA20 -294.223,-477.791 r0 top
DS7 "LED" LED_SSL-LX4673GD-LA20 -282.623,-477.791 r0 top
DS8 "LED" LED_SSL-LX4673GD-LA20 -271.023,-477.791 r0 top
DS9 "LED" LED_SSL-LX4673GD-LA20 -259.423,-477.791 r0 top
DS10 "LED" LED_SSL-LX4673GD-LA20 -247.823,-477.791 r0 top
DS11 "LED" LED_SSL-LX4673GD-LA20 -236.223,-477.791 r0 top
DS12 "LED" LED_SSL-LX4673GD-LA20 -317.423,-506.791 r0 top
DS13 "LED" LED_SSL-LX4673GD-LA20 -294.223,-506.791 r0 top
DS14 "LED" LED_SSL-LX4673GD-LA20 -305.823,-506.791 r0 top
DS15 "LED" LED_SSL-LX4673GD-LA20 -282.623,-506.791 r0 top
DS16 "LED" LED_SSL-LX4673GD-LA20 -271.023,-506.791 r0 top
DS17 "LED" LED_SSL-LX4673GD-LA20 -247.823,-506.791 r0 top
DS18 "LED" LED_SSL-LX4673GD-LA20 -259.423,-506.791 r0 top
DS19 "LED" LED_SSL-LX4673GD-LA20 -236.223,-506.791 r0 top
ENC1 "PEC16-4115F-S0012" FP-PEC16-4115F-S0012-MFG -239.301,-455.836 r0 top
FB1 "BLM21PG600BH1D" 0805-HS -246.259,-444.773 r90 bottom
FB2 "BLM21PG600BH1D" 0805-HS -250.103,-444.773 r90 bottom
H1 "Socket 8.5 mm 2x20 2.54 mm" HDR_2x20_P2.54_S -327.653,-512.751 r90 bottom
H2 "Socket 8.5 mm 2x20 2.54 mm" HDR_2x20_P2.54_S -226.173,-512.751 r90 bottom
H3 "Socket 8.5 mm 1x14 2.54 mm" HDR_1X14_P2.54 -271.423,-489.178 r0 bottom
IC1 "TPS54331DG4" D8_N -256.929,-456.623 r180 bottom
IC2 "ESP32-S3-WROOM-1-N16R2" XCVR_ESP32-S3-WROOM-1-N16R2 -307.284,-444.865 r180 bottom
IC3 "TPS54331DG4" D8_N -239.072,-470.873 r180 bottom
IC4 "DAC8562SDGSR" SOP50P490X110-10N -281.287,-467.215 r90 bottom
IC7 "DAC124S085CIMM_NOPB" SOP50P490X110-10N -299.514,-467.416 r90 bottom
IC10 "SN74HCT125DR" FP-D0014A-IPC_B -289.568,-469.021 r180 bottom
IC11 "DAC124S085CIMM_NOPB" SOP50P490X110-10N -304.364,-467.416 r90 bottom
IC14 "LM4040CEM3-5.0/NOPB" MF03A_L -299.883,-476.975 r270 bottom
J1 "216990-0002" FP-216990-0002-MFG -280.805,-436.126 r0 bottom
J2 "PJ398SM-12" THONK_PJ398SM-12 -317.423,-496.291 r0 top
J3 "PJ398SM-12" THONK_PJ398SM-12 -305.823,-496.291 r0 top
J4 "PJ398SM-12" THONK_PJ398SM-12 -294.259,-496.238 r0 top
J5 "PJ398SM-12" THONK_PJ398SM-12 -282.623,-496.291 r0 top
J6 "PJ398SM-12" THONK_PJ398SM-12 -271.023,-496.291 r0 top
J7 "PJ398SM-12" THONK_PJ398SM-12 -259.423,-496.291 r0 top
J8 "PJ398SM-12" THONK_PJ398SM-12 -247.823,-496.291 r0 top
J9 "PJ398SM-12" THONK_PJ398SM-12 -236.223,-496.291 r0 top
J10 "PJ398SM-12" THONK_PJ398SM-12 -317.423,-517.291 r0 top
J11 "PJ398SM-12" THONK_PJ398SM-12 -271.023,-517.291 r0 top
J12 "PJ398SM-12" THONK_PJ398SM-12 -294.223,-517.291 r0 top
J13 "PJ398SM-12" THONK_PJ398SM-12 -247.823,-517.291 r0 top
J14 "PJ398SM-12" THONK_PJ398SM-12 -305.823,-517.291 r0 top
J15 "PJ398SM-12" THONK_PJ398SM-12 -259.423,-517.291 r0 top
J16 "PJ398SM-12" THONK_PJ398SM-12 -282.623,-517.291 r0 top
J17 "PJ398SM-12" THONK_PJ398SM-12 -236.223,-517.291 r0 top
J18 "TFT" DFR0664_TFT_1X10_P2.54_M2 -321.31,-467.36 r90 top
J19 "Pinheader_1x2" HDR_1X2_P2.54 -270.34,-438.056 r90 bottom
J20 "PJ366ST" THONK_PJ366ST_MIDI_TRS -282.623,-531.791 r0 top
J21 "4208" CONN_CCSH-W10R-04TR-BK-A_ADA -327.152,-458.47 r90 bottom
J22 "PJ398SM-12" THONK_PJ398SM-12 -317.423,-531.791 r0 top
J23 "PJ398SM-12" THONK_PJ398SM-12 -305.823,-531.791 r0 top
J24 "Pinheader_1x2" HDR_1X2_P2.54 -249.004,-448.521 r270 bottom
J26 "PJ398SM-12" THONK_PJ398SM-12 -247.823,-531.791 r0 top
J28 "PJ398SM-12" THONK_PJ398SM-12 -236.223,-531.791 r0 top
J31 "Eurorack PWR 2x5" EURORACK_PWR_2X5_P2.54_SHROUDED -242.197,-438.883 r180 bottom
L1 "6.8uH" IND_SRN6045 -269.621,-455.041 r180 bottom
L2 "6.8uH" IND_SRN6045 -252.128,-472.143 r180 bottom
Q9 "HCPL-0700" D8_N -274.423,-531.291 r0 bottom
Q10 "MMBT3904-7-F" 3904-SOT23 -311.616,-506.753 r180 bottom
Q11 "MMBT3904-7-F" 3904-SOT23 -288.362,-506.687 r180 bottom
Q12 "MMBT3904-7-F" 3904-SOT23 -299.982,-506.915 r180 bottom
Q13 "MMBT3904-7-F" 3904-SOT23 -276.805,-506.966 r180 bottom
Q14 "MMBT3904-7-F" 3904-SOT23 -265.17,-506.813 r180 bottom
Q15 "MMBT3904-7-F" 3904-SOT23 -241.968,-506.941 r180 bottom
Q16 "MMBT3904-7-F" 3904-SOT23 -253.615,-506.814 r180 bottom
Q17 "MMBT3904-7-F" 3904-SOT23 -231.863,-511.022 r180 bottom
R1 "33" FP-RN73R2A-IPC_A -293.751,-451.612 r180 bottom
R2 "332K" FP-RN73R2A-IPC_A -249.528,-454.847 r90 bottom
R3 "10.2K" FP-RN73R2A-IPC_A -265.684,-463.804 r0 bottom
R4 "0" FP-RN73R2A-IPC_A -269.113,-463.677 r0 bottom
R5 "3.24K" FP-RN73R2A-IPC_A -262.128,-463.423 r90 bottom
R6 "68.1K" FP-RN73R2A-IPC_A -250.807,-457.436 r180 bottom
R7 "10K" FP-RN73R2A-IPC_A -290.101,-439.834 r180 bottom
R8 "5.1K" FP-RN73R2A-IPC_A -284.448,-443.565 r90 bottom
R9 "5.1K" FP-RN73R2A-IPC_A -277.359,-443.403 r90 bottom
R10 "5.1K" FP-RN73R2A-IPC_A -309.837,-473.946 r90 bottom
R11 "5.1K" FP-RN73R2A-IPC_A -312.834,-473.946 r90 bottom
R12 "5.1K" FP-RN73R2A-IPC_A -315.704,-473.946 r90 bottom
R13 "29.4K" FP-RN73R2A-IPC_A -264.78,-460.495 r90 bottom
R14 "332K" FP-RN73R2A-IPC_A -232.479,-469.083 r90 bottom
R15 "10.2K" FP-RN73R2A-IPC_A -246.912,-472.098 r90 bottom
R16 "0" FP-RN73R2A-IPC_A -246.438,-475.202 r90 bottom
R17 "1.96K" FP-RN73R2A-IPC_A -244.791,-472.098 r270 bottom
R18 "68.1K" FP-RN73R2A-IPC_A -232.89,-471.672 r180 bottom
R19 "10K" FP-RN73R2A-IPC_A -281.178,-473.329 r0 bottom
R20 "33" FP-RN73R2A-IPC_A -325.755,-453.263 r0 bottom
R21 "33" FP-RN73R2A-IPC_A -325.755,-451.189 r0 bottom
R76 "10K" FP-RN73R2A-IPC_A -316.466,-460.408 r270 bottom
R77 "22" FP-RN73R2A-IPC_A -279.433,-443.656 r90 bottom
R78 "22" FP-RN73R2A-IPC_A -282.125,-443.517 r90 bottom
R79 "29.4K" FP-RN73R2A-IPC_A -236.136,-474.857 r180 bottom
R89 "270" 0805-HS -269.823,-534.291 r90 bottom
R90 "220" 0805-HS -278.823,-535.491 r90 bottom
R91 "1K" 0805-HS -268.638,-528.765 r90 bottom
R92 "300" FP-RN73R2A-IPC_A -321.818,-507.746 r90 bottom
R93 "300" FP-RN73R2A-IPC_A -295.816,-509.825 r0 bottom
R94 "100K" FP-RN73R2A-IPC_A -309.075,-509.825 r0 bottom
R95 "100K" FP-RN73R2A-IPC_A -288.679,-503.512 r270 bottom
R98 "300" FP-RN73R2A-IPC_A -304.096,-509.825 r180 bottom
R99 "300" FP-RN73R2A-IPC_A -284.691,-509.825 r0 bottom
R100 "100K" FP-RN73R2A-IPC_A -299.79,-502.417 r0 bottom
R101 "100K" FP-RN73R2A-IPC_A -277.35,-503.512 r90 bottom
R104 "300" FP-RN73R2A-IPC_A -273.235,-509.825 r0 bottom
R105 "300" FP-RN73R2A-IPC_A -249.174,-509.651 r0 bottom
R106 "100K" FP-RN73R2A-IPC_A -263.685,-503.512 r90 bottom
R107 "100K" FP-RN73R2A-IPC_A -240.415,-503.512 r90 bottom
R110 "300" FP-RN73R2A-IPC_A -259.969,-509.651 r180 bottom
R111 "300" FP-RN73R2A-IPC_A -238.578,-509.825 r0 bottom
R112 "100K" FP-RN73R2A-IPC_A -251.909,-503.512 r90 bottom
R113 "100K" FP-RN73R2A-IPC_A -231.4,-506.012 r0 bottom
R116 "6.8K" FP-RN73R2A-IPC_A -299.88,-479.839 r180 bottom
R117 "10K" FP-RN73R2A-IPC_A -242.815,-461.327 r90 bottom
R118 "10K" FP-RN73R2A-IPC_A -235.923,-449.537 r270 bottom
R119 "10K" FP-RN73R2A-IPC_A -244.889,-461.272 r270 bottom
R120 "10K" FP-RN73R2A-IPC_A -238.059,-449.499 r90 bottom
R121 "10K" FP-RN73R2A-IPC_A -239.673,-461.318 r90 bottom
R122 "10K" FP-RN73R2A-IPC_A -237.599,-461.348 r270 bottom
SW1 "SS-12D00G2" SS12D00_SPDT -292.354,-445.643 r90 bottom
SW2 "SS-12D00G2" SS12D00_SPDT -314.485,-464.955 r180 bottom
SW3 "7101SD9CQE" FP-7101SD9CQE-MFG -294.223,-531.791 r0 top
SW4 "TactileButton" SW_1825910-6-4 -317.423,-483.791 r0 top
SW5 "TactileButton" SW_1825910-6-4 -305.823,-483.791 r0 top
SW6 "TactileButton" SW_1825910-6-4 -294.223,-483.791 r0 top
SW7 "TactileButton" SW_1825910-6-4 -282.623,-483.791 r0 top
SW8 "TactileButton" SW_1825910-6-4 -271.023,-483.791 r0 top
SW9 "TactileButton" SW_1825910-6-4 -259.423,-483.791 r0 top
SW10 "TactileButton" SW_1825910-6-4 -247.823,-483.791 r0 top
SW11 "TactileButton" SW_1825910-6-4 -236.223,-483.791 r0 top
SW12 "TactileButton" KS01_B_12MM -256.954,-448.445 r180 top
SW13 "TactileButton" KS01_B_12MM -256.954,-464.345 r180 top
tp1 "3.3V" TP -266.573,-466.598 r0 bottom value="Test point"
tp2 "3.3V" TP -243.543,-475.216 r0 bottom value="Test point"
tp7 "Test point" TP -276.733,-474.726 r0 bottom
tp8 "Test point" TP -271.272,-470.535 r180 bottom
U1 "AP2112K-3.3TRG1" FP-SOT25-IPC_A -272.27,-446.445 r270 bottom
U2 "LP2985-50DBVR" FP-SOT25-IPC_A -282.708,-458.098 r0 bottom

## Footprints (in the part's own frame and the unit in brackets; to place one, negate y for a bottom-side part, rotate by r counter-clockwise, add the part's x,y. Pads: shape width x height; smd on the part's side, far side on the other; paste and mask are expansions set on the pad)
0805-HS [mm]
  rect 1.255x1.556 smd paste+0 mask+0: 1(-1.025,0) 2(1.025,0)
  silkscreen extent -1.65,-1.18 1.65,1.18, body extent -1,-0.63 1,0.63, height 0.6
3904-SOT23 [mm]
  rect 1.659x0.627 smd paste+0 mask+0: 1(-0.977,0.915)
  rrect100% 1.659x0.627 smd paste+0 mask+0: 2(-0.977,-0.915) 3(0.977,0)
  silkscreen extent 0.23,-1.45 0.65,1.45, body extent -1.2,-1.45 1.2,1.45, height 1.1
4148 [mm]
  rect 1.606x0.472 smd paste+0 mask+0: 1(-1.1,0)
  rrect100% 1.606x0.472 smd paste+0 mask+0: 2(1.1,0)
  silkscreen extent -1.76,-0.65 0.85,0.85, body extent -1.25,-0.63 1.25,0.63, height 0.9
CAP_1210 [mm] "1210 (3225 metric) capacitor, pads 1.15x2.7 mm at +/-1.5 mm"
  rect 1.15x2.7 smd: 1(-1.5,0) 2(1.5,0)
CAPC2013X145X48NL20T23 [mm] "0805 (2012 metric)"
  rect 1.025x1.4 smd paste+0 mask+0: 1(-0.913,0) 2(0.912,0)
  silkscreen extent -0.17,-0.85 0.17,0.85
CONN_CCSH-W10R-04TR-BK-A_ADA [mil]
  rect 24x61 smd paste+0 mask+0: 1(-59.05,80.77) 2(-19.68,80.77) 3(19.69,80.77) 4(59.06,80.77)
  rect 47x71 smd paste+0 mask+0: 5(-110.24,-69.82) 6(110.24,-69.82)
  silkscreen extent -234,-102 123,103
D8_N [mil]
  rect 97.4x23.31 smd paste+0 mask+0: 1(-95.12,75)
  rrect100% 97.4x23.31 smd paste+0 mask+0: 2(-95.12,25) 3(-95.12,-25) 4(-95.12,-75) 5(95.12,-75) 6(95.12,-25) 7(95.12,25) 8(95.12,75)
  silkscreen extent -171,-96 27,96, body extent -118,-96 118,96, height 69
DFR0664_TFT_1X10_P2.54_M2 [mm] "DFRobot DFR0664 2.0in TFT: 1x10 header 2.54mm (pin1=VCC), 4x M2 holes 31.7x56mm, board 35.7x60mm. Verify against module before ordering."
  rect 1.7x1.7 hole 1: 1(0,0)
  round 1.7 hole 1: 2(2.54,0) 3(5.08,0) 4(7.62,0) 5(10.16,0) 6(12.7,0) 7(15.24,0) 8(17.78,0) 9(20.32,0) 10(22.86,0)
  round 4 hole 2.2: MH(-4.42,0) MH(-4.42,-56) MH(27.28,0) MH(27.28,-56)
  silkscreen extent -6.42,-58 29.28,2, body extent -6.25,-57.31 29.45,2.7, height 14
EURORACK_PWR_2X5_P2.54_SHROUDED [mm] "Eurorack power header 2x5 2.54mm shrouded, pin1 = -12V (red stripe)"
  rect 1.7x1.7 hole 1: 1(0,0)
  round 1.7 hole 1: 2(0,2.54) 3(2.54,0) 4(2.54,2.54) 5(5.08,0) 6(5.08,2.54) 7(7.62,0) 8(7.62,2.54) 9(10.16,0) 10(10.16,2.54)
  silkscreen extent -6.35,-3.18 15.24,5.72
FP-7101SD9CQE-MFG [mm]
  oval 2.7x1.7 hole 0.9 square: 1(0,2.54) 2(0,0) 3(0,-2.54)
  silkscreen extent -2.66,-4.19 2.64,4.11
FP-216990-0002-MFG [mm]
  rrect100% 1x1.8 hole 1.4 slot 0.6 at 0 deg paste-2539.97 mask+0: 1(-5.62,2.85) 2(5.62,2.85)
  rrect100% 1x2.2 hole 1.8 slot 0.6 at 0 deg paste-2539.97 mask+0: 3(-5.62,-1.15) 4(5.62,-1.15)
  rect 0.6x1.1 smd paste+0 mask+0: A1-B12(-3.2,4) A4-B9(-2.4,4) B1-A12(3.2,4) B4-A9(2.4,4)
  rect 0.3x1.1 smd paste+0 mask+0: A5(-1.25,4) A6(-0.25,4) A7(0.25,4) A8(1.25,4) B5(1.75,4) B6(0.75,4) B7(-0.75,4) B8(-1.75,4)
  silkscreen extent -4.57,3.9 -3.07,5.25, body extent -5.77,-3.25 5.77,3.95, height 2.36
FP-D0014A-IPC_B [mm] "SOIC, 14-Leads, Body 8.75x4mm, Pitch 1.27mm, IPC Low Density"
  rrect15% 1.65x0.65 smd: 1(-2.825,3.81) 2(-2.825,2.54) 3(-2.825,1.27) 4(-2.825,0) 5(-2.825,-1.27) 6(-2.825,-2.54) 7(-2.825,-3.81) 8(2.825,-3.81) 9(2.825,-2.54) 10(2.825,-1.27) 11(2.825,0) 12(2.825,1.27) 13(2.825,2.54) 14(2.825,3.81)
  silkscreen extent -2.95,-4.38 1.6,4.81, body extent -3.02,-4.32 3.02,4.32, height 1.59
FP-PEC16-4115F-S0012-MFG [mm]
  rrect100% 2.6x4.7 hole 4.1 slot 2 at 0 deg paste-2539.97 mask+0: 1(-7.4,2.1) 2(7.4,2.1)
  rect 1.85x1.85 hole 1.2 paste-2539.97 mask+0: A(-5,-8.4)
  round 1.85 hole 1.2 paste-2539.97 mask+0: B(0,-8.4) C(5,-8.4) D(-2.5,9.1) E(2.5,9.1)
  silkscreen extent -8,-11.35 8,10.4, body extent -8.8,-10.5 8.8,10.5, height 0.25
FP-RN73R2A-IPC_A [mm] "0805 (2012 metric)"
  rect 1.025x1.4 smd paste+0 mask+0: 1(-0.913,0) 2(0.913,0)
  silkscreen extent -0.17,-0.85 0.17,0.85
FP-SMA-MFG [mm]
  rect 2.5x1.7 smd paste+0 mask+0: 1(-2,0) 2(2,0)
  silkscreen extent -3.92,-1.46 2.3,1.46, body extent -2.6,-1.3 2.6,1.3, height 2.4
FP-SOT25-IPC_A [mm]
  rect 1.707x0.616 smd paste+0 mask+0: 1(-1.201,0.95)
  rrect100% 1.707x0.616 smd paste+0 mask+0: 2(-1.201,0) 3(-1.201,-0.95) 4(1.201,-0.95) 5(1.201,0.95)
  silkscreen extent -3.08,-1.75 1.4,1.75, body extent -1.4,-1.47 1.4,1.45, height 1.45
HDR_1X2_P2.54 [mm] "Pin header 1x2, 2.54 mm"
  rect 1.7x1.7 hole 1: 1(0,0)
  round 1.7 hole 1: 2(2.54,0)
HDR_1X14_P2.54 [mm] "Single-row header 1x14, 2.54 mm pitch (board-to-board)"
  rect 1.7x1.7 hole 1: 1(-16.51,0.013)
  round 1.7 hole 1: 2(-13.97,0.013) 3(-11.43,0.013) 4(-8.89,0.013) 5(-6.35,0.013) 6(-3.81,0.013) 7(-1.27,0.013) 8(1.27,0.013) 9(3.81,0.013) 10(6.35,0.013) 11(8.89,0.013) 12(11.43,0.013) 13(13.97,0.013) 14(16.51,0.013)
  silkscreen extent -18.38,-1.59 17.78,1.61
HDR_2x20_P2.54_S [mm] "Socket 2x20, 2.54 mm, 8.5 mm (main board, bottom; rows swapped)"
  rect 1.7x1.7 hole 1: 1(-24.13,-1.27)
  round 1.7 hole 1: 2(-24.13,1.27) 3(-21.59,-1.27) 4(-21.59,1.27) 5(-19.05,-1.27) 6(-19.05,1.27) 7(-16.51,-1.27) 8(-16.51,1.27) 9(-13.97,-1.27) 10(-13.97,1.27) 11(-11.43,-1.27) 12(-11.43,1.27) 13(-8.89,-1.27) 14(-8.89,1.27) 15(-6.35,-1.27) 16(-6.35,1.27) 17(-3.81,-1.27) 18(-3.81,1.27) 19(-1.27,-1.27) 20(-1.27,1.27) 21(1.27,-1.27) 22(1.27,1.27) 23(3.81,-1.27) 24(3.81,1.27) 25(6.35,-1.27) 26(6.35,1.27) 27(8.89,-1.27) 28(8.89,1.27) 29(11.43,-1.27) 30(11.43,1.27) 31(13.97,-1.27) 32(13.97,1.27) 33(16.51,-1.27) 34(16.51,1.27) 35(19.05,-1.27) 36(19.05,1.27) 37(21.59,-1.27) 38(21.59,1.27) 39(24.13,-1.27) 40(24.13,1.27)
  silkscreen extent -26,-2.54 25.4,2.8
IND_SRN6045 [mm] "6x6 mm shielded power inductor (Bourns SRN6045), pads 1.8x5.1 mm, 6.5 mm overall"
  rect 1.8x5.1 smd: 1(-2.35,0) 2(2.35,0)
KS01_B_12MM [mm] "Highly Electric KS01-B (no LED) 12 mm round tact switch, 4x 1.0 mm holes on 5.0x5.0 mm grid; 1-2 common, 3-4 common"
  rect 1.498x1.498 / inner round 1.498 / far side rect 1.498x1.498 hole 0.99 mask+0.102: 1(-2.5,2.5)
  round 1.498 hole 0.99 mask+0.102: 2(2.5,2.5) 3(-2.5,-2.5) 4(2.5,-2.5)
  silkscreen extent -4.54,-2.99 3,2.99, body extent -3.77,-2.94 4.03,3.05, height 5.08
LED_0805 [mm] "0805 SMD LED, pad 1 = anode, pad 2 = cathode"
  rect 1.255x1.556 smd paste+0 mask+0: 1(-1.025,0) 2(1.025,0)
  silkscreen extent -1.65,-1.18 1.65,1.18, body extent -1,-0.63 1,0.63, height 0.6
LED_SSL-LX4673GD-LA20 [mm]
  rect 1.358x1.358 / inner round 1.358 / far side rect 1.358x1.358 hole 0.85 mask+0.102: 1(-1.27,0)
  round 1.358 hole 0.85 mask+0.102: 2(1.27,0)
  silkscreen extent -3.08,-1.83 3.07,1.83
MF03A_L [mm] "SOT23, 3-Leads, Body 2.9x1.3mm, Pitch 0.95mm, Lead Span 2.4mm, IPC Medium Density"
  rect 1.3x0.6 smd: 1(-1.05,0.95) 2(-1.05,-0.95) 3(1.05,0)
  silkscreen extent -1.17,-1.5 0.7,1.92, body extent -0.7,-1.52 0.7,1.52, height 1.12
SOP50P490X110-10N [mm]
  rect 1.4x0.3 smd: 1(-2.2,1) 2(-2.2,0.5) 3(-2.2,0) 4(-2.2,-0.5) 5(-2.2,-1) 6(2.2,-1) 7(2.2,-0.5) 8(2.2,0) 9(2.2,0.5) 10(2.2,1)
  silkscreen extent -2.9,-1.5 1.15,1.5
SS12D00_SPDT [mm] "SS-12D00 SPDT slide switch, 3 pins 2.54 mm, body 8.5 x 4 mm"
  rect 1.6x1.6 hole 1: 1(-2.54,0.013)
  round 1.6 hole 1: 2(0,0.013) 3(2.54,0.013)
  silkscreen extent -4.3,-1.99 4.3,2.01
SW_1825910-6-4 [mm]
  rect 1.498x1.498 / inner round 1.498 / far side rect 1.498x1.498 hole 0.99 mask+0.102: 1(-3.25,2.25)
  round 1.498 hole 0.99 mask+0.102: 2(3.25,2.25) 3(-3.25,-2.25) 4(3.25,-2.25)
  silkscreen extent -4.54,-3 3,3, body extent -3.77,-2.94 4.03,3.05, height 5.08
THONK_PJ366ST_MIDI_TRS [mm] "Stereo Thonkiconn (QingPu WQP-PJ366ST / WQP419GR) for MIDI TRS Type A: pad 5 = tip, 4 = ring, 2 = sleeve"
  oval 2.216x1.108 hole 0.6 square: 2(0,-6.48) 4(0,-3.38)
  oval 2.016x1.008 hole 0.5 square: 5(0,4.92)
  Keep-Out Layer region: 2.8,-2.8 -2.8,-2.8 -2.8,2.8 2.8,2.8
  silkscreen extent -4.5,-7.65 4.5,6, body extent -4.5,-7.55 4.5,6, height 14.5
THONK_PJ398SM-12 [mm]
  oval 2.216x1.108 hole 0.6 square: 1(0,-6.48) 2(0,-3.38)
  oval 2.016x1.008 hole 0.5 square: 3(0,4.92)
  Keep-Out Layer region: 2.8,-2.8 -2.8,-2.8 -2.8,2.8 2.8,2.8
  silkscreen extent -4.5,-7.65 4.5,6, body extent -4.5,-7.55 4.5,6, height 14.5
TP [mil]
  round 60 hole 30: 1(0,0)
WCAP-ASLI_D4H5.5 [mm] "Aluminium Electrolytic V-Chip SMT Capacitors, 4x5.5mm"
  rect 2.6x1.6 smd: 1(1.8,0) 2(-1.8,0)
  silkscreen extent -2.25,-2.25 2.25,2.25, body extent -2.5,-2.15 2.5,2.15, height 5.5
XCVR_ESP32-S3-WROOM-1-N16R2 [mm]
  rect 1.5x0.9 smd: 2(-8.75,3.99) 3(-8.75,2.72) 4(-8.75,1.45) 5(-8.75,0.18) 6(-8.75,-1.09) 7(-8.75,-2.36) 8(-8.75,-3.63) 9(-8.75,-4.9) 10(-8.75,-6.17) 11(-8.75,-7.44) 12(-8.75,-8.71) 13(-8.75,-9.98) 14(-8.75,-11.25) 27(8.75,-11.25) 28(8.75,-9.98) 29(8.75,-8.71) 30(8.75,-7.44) 31(8.75,-6.17) 32(8.75,-4.9) 33(8.75,-3.63) 34(8.75,-2.36) 35(8.75,-1.09) 36(8.75,0.18) 37(8.75,1.45) 38(8.75,2.72) 39(8.75,3.99) GND(-8.75,5.26) GND(8.75,5.26)
  rect 0.9x1.5 smd: 15(-6.985,-12.5) 16(-5.715,-12.5) 17(-4.445,-12.5) 18(-3.175,-12.5) 19(-1.905,-12.5) 20(-0.635,-12.5) 21(0.635,-12.5) 22(1.905,-12.5) 23(3.175,-12.5) 24(4.445,-12.5) 25(5.715,-12.5) 26(6.985,-12.5)
  rect 0.9x0.9 smd: GND(-2.9,-3.86) GND(-2.9,-2.46) GND(-2.9,-1.06) GND(-1.5,-3.86) GND(-1.5,-2.46) GND(-1.5,-1.06) GND(-0.1,-3.86) GND(-0.1,-2.46) GND(-0.1,-1.06)
  round 0.4 hole 0.2 mask+0: GND(-2.9,-3.16) GND(-2.9,-1.76) GND(-2.2,-3.86) GND(-2.2,-2.46) GND(-2.2,-1.06) GND(-1.5,-3.16) GND(-1.5,-1.76) GND(-0.8,-3.86) GND(-0.8,-2.46) GND(-0.8,-1.06) GND(-0.1,-3.16) GND(-0.1,-1.76)
  Keep-Out Layer region: 9,6.75 -9,6.75 -9,12.75 9,12.75
  Keep-Out Layer region: 9,6.75 -9,6.75 -9,12.75 9,12.75
  silkscreen extent -10.3,-12.75 9,12.01, body extent -9,-12.75 9,12.75, height 3.25

## Part data
C1 C2 C3 C4 C5 C6 C7 C8 C9 C10 C11 C12 C13 C14 C15 C16 C17 C18 C19 C20 C21 C22 C23 C24 C25 C26 C27 C28 C29 C37 C38 C39 C41 C42 C43 C61 C62 C63 C64 C65 C66 C82 C84 C86 C88 C89 C90 C91 C92: library part CAP, Manufacturer=Vitramon, Part Number=VJ0805Y682KXAMT
C40: library part CAP-np, Manufacturer=Vitramon, Part Number=VJ0805Y682KXAMT
C83 C85: library part Cap_polarized, "WCAP-ASLI Aluminum Electrolytic Capacitors", Capacitance=10µF, Case/Package=Radial, ESR (Equivalent Series Resistance)=1.66693Ω, Insulation Resistance=5.33333MΩ, Leakage Current=3µA, Max Operating Temperature=105°C, Min Operating Temperature=-55°C, Ripple Current=80mA, Tolerance=20%, Voltage Rating=16V, Diameter=4mm, Height=5.5mm, Height - Seated (Max)=5.5118mm, Impedance=2.2Ω, Lead Free="Lead Free", Length=5.5mm, Life (Hours)=2000hours, Mount="Surface Mount", Polarity=Polar, REACH SVHC=Unknown, Ripple Current (AC)=80mA, RoHS=Compliant, Voltage Rating (DC)=16V, Width=4.3mm
D1 D2: library part SCHOTTKY, "DIODE SCHOTTKY 40V 3A SMA", Average Rectified Current=3A, Capacitance=250pF, Case/Package=SMA, Forward Voltage=500mV, Max Forward Surge Current (Ifsm)=80A, Max Operating Temperature=125°C, Max Repetitive Reverse Voltage (Vrrm)=40V, Max Reverse Current=500uA, Min Operating Temperature=-55°C, Package Quantity=5000, Contact Plating=Tin, Current=3A, Current Rating=3A, Element Configuration=Single, Forward Current=3A, Height=2.3mm, Lead Free="Lead Free", Length=4.6mm, Max Reverse Voltage (DC)=40V, Mount="Surface Mount", Number of Pins=2, Output Current=3A, Packaging="Tape and Reel", Peak Non-Repetitive Surge Current=80A, Polarity=Standard, Radiation Hardening=No, REACH SVHC="No SVHC", RoHS Compliant=Yes, Series=-, Termination=SMD/SMT, Voltage=40V, Voltage Rating (DC)=40V, Weight=0.002258oz, Width=2.92mm
D11 D14 D15: library part 4148WS, "DIODE GEN PURP 75V 150MA SOD323F", Average Rectified Current=150mA, Forward Voltage=1V, Max Forward Surge Current (Ifsm)=2A, Max Operating Temperature=150°C, Max Repetitive Reverse Voltage (Vrrm)=75V, Min Operating Temperature=-55°C, Package Quantity=1, Peak Reverse Current=5uA, Power Dissipation=200mW, Contact Plating=Tin, Element Configuration=Single, Forward Current=150mA, Height=1mm, Lead Free="Lead Free", Length=1.8mm, Max Reverse Voltage (DC)=75V, Mount="Surface Mount", Number of Pins=2, Packaging="Tape and Reel", Radiation Hardening=No, REACH SVHC="No SVHC", Recovery Time=4ns, Reverse Recovery Time=4ns, Reverse Voltage=75V, Weight=0.0276g, Width=1.35mm
DS1 DS2 DS3: library part CMP-1674-00012-1, "Through Hole Lamp, 2.1 V, -55 to 100 degC, 2-Pin THD, RoHS, Bulk", Case Code (Imperial)=0603, Case Code (Metric)=1608, Colour=White, Forward Current="20 mA", Forward Voltage="3.6 V", Max Operating Temperature="85 degC", Min Operating Temperature="-40 degC", Package Quantity=4000, Power Rating="78 mW", Case\Package=0603, ComponentLink1Description="Manufacturer URL", ComponentLink1URL=http://www.us.liteon.com/, ComponentLink2Description=Datasheet, ComponentLink2URL=https://datasheet.ciiva.com/4269/s-110-ltl-1chye-4269126.pdf, DatasheetVersion="Rev. B, 07/2013", Height="0.6 mm", Illumination Colour=White, Length="1.6 mm", Lens Style=Diffused, Luminous Intensity="200 mcd", Mount="Surface Mount", Nominal Vf="3.6 V", PackageDescription="2-Pin Through Hole Device, Dia 3.8 mm, Pitch 2.54 mm", PackageReference=LTL-1CHYE, Packaging="Tape and Reel", Pins=2, Radiation Hardening=No, REACH SVHC="No SVHC", RoHSCompliant=true, Viewing Angle="140 degrees", Width="0.8 mm"
DS4 DS5 DS6 DS7 DS8 DS9 DS10 DS11 DS12 DS13 DS14 DS15 DS16 DS17 DS18 DS19: library part LED-Y, "Through Hole Lamp, 2.1 V, -55 to 100 degC, 2-Pin THD, RoHS, Bulk", Case Code (Imperial)=0603, Case Code (Metric)=1608, Colour=White, Forward Current="20 mA", Forward Voltage="3.6 V", Max Operating Temperature="85 degC", Min Operating Temperature="-40 degC", Package Quantity=4000, Power Rating="78 mW", Case\Package=0603, ComponentLink1Description="Manufacturer URL", ComponentLink1URL=http://www.us.liteon.com/, ComponentLink2Description=Datasheet, ComponentLink2URL=https://datasheet.ciiva.com/4269/s-110-ltl-1chye-4269126.pdf, DatasheetVersion="Rev. B, 07/2013", Height="0.6 mm", Illumination Colour=White, Length="1.6 mm", Lens Style=Diffused, Luminous Intensity="200 mcd", Mount="Surface Mount", Nominal Vf="3.6 V", PackageDescription="2-Pin Through Hole Device, Dia 3.8 mm, Pitch 2.54 mm", PackageReference=LTL-1CHYE, Packaging="Tape and Reel", Pins=2, Radiation Hardening=No, REACH SVHC="No SVHC", RoHSCompliant=true, Viewing Angle="140 degrees", Width="0.8 mm"
ENC1: library part ROTARY, "ROTARY ENCODER MECHANICAL 12PPR", Max Operating Temperature=70°C, Min Operating Temperature=-30°C, Operating Supply Voltage=5V, Package Quantity=50, Built in Switch=Yes, Detent=Yes, Encoder Type=Mechanical, Height=17.3mm, Length=23mm, Mount="Through Hole", Number of Channels=2, Orientation=Vertical, Output Type=Quadrature, Pulses per Revolution=12, RoHS Compliant=Yes, Series=PEC16, Termination="PC Pin", Width=16mm
FB1 FB2: library part Ferrite, "Chip Ferrite Bead, 0805, 60Ω @ 100MHz, 0.02Ω, 25%, 1.9A", RoHS Compliant=No
H1 H2: library part Header_2x20
H3: library part Header_1x14
IC1 IC3: library part TPSS54331, "Buck Step Down Regulator with 3.5 to 28 V Input and 0.8 to 25 V Output, -40 to 150 degC, 8-Pin SOIC (D), Green (RoHS & no Sb/Br)", Manufacturer="Texas Instruments", Rating=Catalog, Switch Current Limit(Typ)(A)=3.5, Code_JEDEC=MS-012AA, ComponentLink1Description=Datasheet, ComponentLink1URL=http://www.ti.com/general/docs/lit/getliterature.tsp?genericPartNumber=TPS54331&fileType=pdf, ComponentLink2Description="Package Specification", ComponentLink2URL=http://www.ti.com/litv/pdf/msoi002j, ComponentLink3Description="URL Link1", ComponentLink3URL="Samples URL:http://www.ti.com/product/tps54331#samples", DatasheetVersion=SLVS839D, Duty Cycle(Max)(%)=90, Eco-Plan="Green (RoHS & no Sb/Br)", Iout(Max)(A)=3, Iq(Typ)(mA)=0.11, Mounting Technology="Surface Mount", PackageDescription="8-Pin Plastic Small Outline Integrated Circuit, 4.9 x 3.9 mm, Pitch 1.27 mm Pitch", PackageReference=D8, PackageVersion="revM, Jun-2011", PartNumber=TPS54331DG4, Regulated Outputs(#)=1, SubFamily="Step-Down Regulator", Topology=Buck, Vin(Max)(V)=28, Vin(Min)(V)=3.5, Vout(Max)(V)=25, Vout(Min)(V)=0.8
IC2: "Bluetooth, WiFi 802.11b/g/n, Bluetooth v5.0 Transceiver Module 2.4GHz PCB Trace Surface Mount", Package="NON STANDARD Espressif Systems", Check_prices=https://www.snapeda.com/parts/ESP32S3WROOM1N16R2/Espressif+Systems/view-part/?ref=eda, MF="Espressif Systems", MP=ESP32S3WROOM1N16R2, SnapEDA_Link=https://www.snapeda.com/parts/ESP32S3WROOM1N16R2/Espressif+Systems/view-part/?ref=snap
IC4: "16-bit, dual-channel, low-power, ultra-low glitch, voltage output DAC with 2.5V, 4ppm/C reference", Manufacturer_Name="Texas Instruments", Mouser Part Number=595-DAC8562SDGSR, Datasheet Link=http://www.ti.com/lit/gpn/dac8562, Geometry.Height=1.1mm, Manufacturer_Part_Number=DAC8562SDGSR, Mouser Price/Stock=https://www.mouser.co.uk/ProductDetail/Texas-Instruments/DAC8562SDGSR?qs=L4ss%2FyqpMWQjhHzbOFnTNg%3D%3D
IC7 IC11: "12-Bit Micro Power QUAD Digital-to-Analog Converter with Rail-to-Rail Output", Manufacturer_Name="Texas Instruments", Manufacturer_Part_Number=DAC124S085CIMM/NOPB, Mouser Part Number=926-DAC124S085CIMMNO, Datasheet Link=http://www.ti.com/lit/gpn/dac124s085, Geometry.Height=1.1mm, Mouser Price/Stock=https://www.mouser.co.uk/ProductDetail/Texas-Instruments/DAC124S085CIMM-NOPB?qs=7X5t%252BdzoRHBv34DgWfHrUA%3D%3D
IC10: library part 74HCT125, "IC BUF NON-INVERT 5.5V 14SOIC", Case/Package=SOIC, High Level Output Current=-6mA, Low Level Output Current=6mA, Max Operating Temperature=85°C, Max Supply Voltage=5.5V, Min Operating Temperature=-40°C, Min Supply Voltage=4.5V, Operating Supply Voltage=5V, Package Quantity=2500, Quiescent Current=8uA, Contact Plating=Gold, Height=1.58mm, Lead Free="Lead Free", Length=8.65mm, Logic Function=Buffer, Mount="Surface Mount", Number of Bits=4, Number of Bits per Element=1, Number of Channels=4, Number Of Circuits=4, Number of Elements=4, Number of Input Lines=4, Number Of Inputs=4, Number of Output Lines=4, Number Of Outputs=4, Number of Pins=14, Packaging="Tape and Reel", Polarity=Non-Inverting, Propagation Delay=50ns, Radiation Hardening=No, REACH SVHC="No SVHC", RoHS Compliant=Yes, Turn-On Delay Time=36ns, Width=3.91mm
IC14: library part lm4040, "Precision Micropower Shunt Voltage Reference, 3-pin SOT-23, Pb-Free", Manufacturer="National Semiconductor", PackageTopMarking=R5C*XTT, PowerWise=N, ComponentLink1Description="LM4040 Datasheet", ComponentLink1URL=http://www.national.com/ds/LM/LM4040.pdf, ComponentLink2Description="LM4040 Web Page", ComponentLink2URL=http://www.national.com/pf/LM/LM4040.html, ComponentLink3Description="MF03A Package Page", ComponentLink3URL=http://www.national.com/packaging/folders/mf03a.html, CompType="Voltage Reference IC", DatasheetVersion=Apr-2005, PackageDescription="Molded SOT-23, .115 x .051 x .037in Body, 3 Lead, .075 in Pitch", PackageReference=MF03A, PackageVersion="revB, Mar-2003", PinCount=3, RevisionNote="Component URLs added", RoHS=Y
J1: library part USBC16, "CONN RCP USB2.0 TYP C 24P SMD RA"
J2 J3 J4 J5 J6 J7 J8 J9 J10 J11 J12 J13 J14 J15 J16 J17 J22 J23 J26 J28: "3.5mm Switching Jack Socket", Package=Package, Availability="Not in stock", MF=Thonk, MP=PJ398SM-12, Price=None
J18: library part DFR0664
J20: library part MIDI_connector, "3.5mm TRS jack (stereo Thonkiconn PJ366ST), MIDI TRS Type A: tip=5, ring=4, sleeve=2", Case/Package=Metal, Color=Black, Current Rating=3A, Package Quantity=1, Voltage Rating=34V, Body Material=Metal, Connector Type=Receptacle, Contact Plating=Nickel, Contact Type=Pin, Fastening Type=Pull, Gender=Female, Insulation Material=Plastic, Lead Free="Lead Free", Mount="Through Hole", Number of Contacts=5, Number of Ports=1, Number of Positions=5, Number of Terminals/Pins=5, Orientation="Right Angle", Packaging=Bulk, Radiation Hardening=No, RoHS Compliant=Yes, Series=-, Strain Relief="No (Without)", Termination=Solder
J21: "Description", Manufacturer_Name="Adafruit Industries", Copyright="Copyright (C) 2025 Ultra Librarian. All rights reserved.", Manufacturer_Part_Number=4208, RefDes=RefDes, Type=Type
J31: library part EURORACK_PWR_2x5, "Eurorack power header 2x5 shrouded. Pin 1-2 -12V (red stripe), 3-8 GND, 9-10 +12V"
L1 L2: library part Inductor, "6.8uH shielded power inductor 6x6 mm, Isat >= 2 A (e.g. Bourns SRN6045TA-6R8M)", Ambient Temperature Range High=85°C, Case/Package=0805, DC Resistance (DCR)=50mΩ, Inductance=110nH, Max DC Current=2A, Min Operating Temperature=-40°C, Self Resonant Frequency=1.2GHz, Test Frequency=7.9MHz, Tolerance=2%, Composition=Wirewound, Core Material="Ceramic, Ferrite", Height=1.6mm, Lead Free="Contains Lead", Length=2.29mm, Lifecycle Status=Production, Max Operating Temperature=85°C, NexarPartId=6751235, Q Factor=19, RMS Current (Irms)=2A, RoHS=Compliant, Series Resistance=50mΩ, Termination=SMD/SMT, Weight=5.499807mg, Width=1.91mm
Q9: library part 6n137, "Optocoupler, Darlington output (6N138 type), SO-8", Ambient Temperature Range High=+85°C, Ambient Temperature Range Low=-40°C, Forward Current=10mA, Forward Voltage=1.5V, Isolation Voltage=3750Vrms, Manufacturer=Broadcom, Manufacturer Part Number=HCPL-0700-000E, Max Supply Voltage=5.5V, Min Supply Voltage=4.5V, Package=0, Reverse Voltage=5V, Temperature="-40°C to +85°C", Automotive=No, Category=Trans, ComponentLink2Description=Datasheet, ComponentLink2URL=https://docs.broadcom.com/docs/AV02-0940EN, Device Class L1=Optoelectronics, Device Class L2=Optocouplers, Device Class L3=unset, Digikey Description="OPTOISO 3.75KV OPN COLL 8DIP GW", Height=4.455mm, Lead Free=Yes, Mouser Description="High Speed Optocouplers 10 Mb/s 3750Vrms", Octopart=https://octopart.com/search?q=HCPL-0700-000E, RoHS=TRUE, Standoff Height=0.505mm, Temperature Range High=+85°C, Temperature Range Low=-40°C, Turn Off Delay Time=50ns, Turn On Delay Time=48ns
Q10 Q11 Q12 Q13 Q14 Q15 Q16 Q17: library part 3904, "TRANS NPN 40V 0.2A SMD SOT23-3", Case/Package=SOT-23, Collector Base Voltage (VCBO)=60V, Collector Emitter Breakdown Voltage=40V, Collector Emitter Saturation Voltage=300mV, Continuous Collector Current=200mA, Emitter Base Voltage (VEBO)=6V, Frequency=300MHz, Max Operating Temperature=150°C, Max Power Dissipation=300mW, Min Operating Temperature=-55°C, Package Quantity=3000, Power Dissipation=350mW, Collector Emitter Voltage (VCEO)=40V, Contact Plating=Tin, Element Configuration=Single, Gain Bandwidth Product=300MHz, Height=1mm, hFE Min=100, Lead Free="Lead Free", Length=3.05mm, Max Breakdown Voltage=40V, Max Collector Current=200mA, Max Frequency=300MHz, Mount="Surface Mount", Number of Elements=1, Number of Pins=3, Packaging="Tape and Reel", Polarity=NPN, Radiation Hardening=No, REACH SVHC="No SVHC", Transition Frequency=300MHz, Voltage Rating (DC)=40V, Weight=0.000282oz, Width=1.4mm
R1 R2 R3 R4 R5 R6 R7 R8 R9 R10 R11 R12 R13 R14 R15 R16 R17 R18 R19 R20 R21 R76 R77 R78 R79 R89 R90 R91 R92 R93 R94 R95 R98 R99 R100 R101 R104 R105 R106 R107 R110 R111 R112 R113 R116 R117 R118 R119 R120 R121 R122: library part Resistor, "RES 10K OHM 0.1% 1/8W 0805"
SW1 SW2: library part Switch, "Switch Slide ON ON SPDT Side Slide 0.1A 12VDC 10000Cycles PC Pins Bracket Mount/Through Hole Bulk", Package=None, Check_prices=https://www.snapeda.com/parts/OS102011MA1QN1/Littelfuse/view-part/?ref=eda, MF=Littelfuse/C&K, MP=OS102011MA1QN1, SnapEDA_Link=https://www.snapeda.com/parts/OS102011MA1QN1/Littelfuse/view-part/?ref=snap
SW3: library part SPDT, "7101SD9CQE Toggle Switch, Spdt, On-On, Maintained, 5A, 28Vdc, 3 Pcb Hole Cnt, Solder Terminal, Toggle", Contact Current Rating=5A, Contact Resistance=10mΩ, Max Operating Temperature=85°C, Max Voltage Rating (AC)=250V, Max Voltage Rating (DC)=28V, Min Operating Temperature=-30°C, Voltage Rating (AC)=120V, Actuator Length=12.45mm, Actuator Material="Brass, Chrome", Contact Material=Silver, Contact Plating=Silver, Current Rating=5A, Depth=6.86mm, Electrical Life=100kcycles, Housing Material="Stainless Steel", Illumination Type="Illuminated, Non-Illuminated", Lead Free="Lead Free", Length=12.7mm, Life (Cycles)=100kcycles, Max Current Rating=5A, Mount="Through Hole", NexarPartId=55410166, Orientation=Straight, Radiation Hardening=No, RoHS=Compliant, Switch Function=On-On, Termination="PC Pins", Throw Configuration=SPDT, Voltage Rating (DC)=28V
SW4 SW5 SW6 SW7 SW8 SW9 SW10 SW11 SW12 SW13: "FSM4JH=6MM TACT SWITCH, HIGH TEMP", Package=None, Check_prices=https://www.snapeda.com/parts/1825910-6/TE+Connectivity+Alcoswitch+Switches/view-part/?ref=eda, MF="TE Connectivity", MP=1825910-6, SnapEDA_Link=https://www.snapeda.com/parts/1825910-6/TE+Connectivity+Alcoswitch+Switches/view-part/?ref=snap
tp1 tp2 tp7 tp8: library part Testpoint
U1: library part CMP-12756-000035-1, "IC REG LINEAR 3.3V 600MA SOT25", Case/Package=SOT-23-5, Dropout Voltage=250mV, Max Input Voltage=6V, Max Operating Temperature=85°C, Max Output Current=600mA, Min Input Voltage=2.5V, Min Operating Temperature=-40°C, Output Voltage=3.3V, Package Quantity=1, Quiescent Current=55uA, Accuracy=1.5%, Height=1.3mm, Lead Free="Lead Free", Length=3.1mm, Mount="Surface Mount", Number Of Outputs=1, Number of Pins=5, Number of Regulators=1, Output Current=600mA, Output Type=Fixed, Packaging="Tape and Reel", Polarity=Positive, Width=1.7mm
U2: library part CMP-12756-000035-1, "Low-noise LDO 5.0 V 150 mA, SOT-23-5 (DAC supply +5A)", Case/Package=SOT-23-5, Dropout Voltage=250mV, Max Input Voltage=6V, Max Operating Temperature=85°C, Max Output Current=600mA, Min Input Voltage=2.5V, Min Operating Temperature=-40°C, Output Voltage=3.3V, Package Quantity=1, Quiescent Current=55uA, Accuracy=1.5%, Height=1.3mm, Lead Free="Lead Free", Length=3.1mm, Mount="Surface Mount", Number Of Outputs=1, Number of Pins=5, Number of Regulators=1, Output Current=600mA, Output Type=Fixed, Packaging="Tape and Reel", Polarity=Positive, Width=1.7mm

## Via types
v1: diameter 0.6, hole 0.3, Top Layer to Bottom Layer, 407 vias
v2: diameter 0.4, hole 0.2, Top Layer to Bottom Layer, 7 vias
v3: diameter 0.8, hole 0.4, Top Layer to Bottom Layer, 4 vias

## Nets (pads, with @x,y where several pads share a name; then routed paths per layer and width w, separated by ;. In a path a pad name is that pad's centre, name@x,y a point inside that pad or via, vN(x,y) a via of type N, cw(c..) or ccw(c..) an arc to the next point about the centre after c; other vN are vias at no path point)
+3.3: C10.2 C11.2 C17.2 C40.2 C61.2 H1.39 IC2.2 J19.2 J21.2 L1.2 Q9.8 R4.1 R7.2 R11.1 R76.2 R89.2 R117.2 R118.2 R121.2 | length 310.5
  Top Layer w0.254: v1(-288.29,-482.092) -288.29,-474.736 -289.171,-473.855 -289.171,-466.592 -282.321,-459.742 -282.321,-456.577 -282.448,-456.45 v3(-282.448,-453.136)
  SIG_MID w0.254: v1(-312.293,-476.758) -308.586,-480.465 -297.027,-480.465 -294.875,-482.617 -288.815,-482.617 v1(-288.29,-482.092)
  PWR w0.254: H1.39@-328.923,-488.621 -326.255,-485.953 -326.255,-484.868 -323.031,-481.644 -323.031,-480.252 -319.243,-476.464 -312.681,-476.464 -312.387,-476.758 v1(-312.293,-476.758) ; v1(-322.961,-463.423) -322.927,-463.457 -319.048,-463.457 -317.118,-461.527 v1(-313.944,-461.527) -313.944,-463.889 -313.146,-464.687 -313.072,-464.761 -313.072,-465.877 v1(-311.309,-472.615) ; v1(-273.304,-527.939) v1@-273.05,-527.939
  PWR w0.5: v1(-288.29,-482.092) -288.29,-482.119 -288.144,-482.265 -288.144,-487.066 -290.818,-489.74 -290.818,-515.332 -283.383,-522.767 -278.476,-522.767 v1(-273.304,-527.939) ; v1@-273.05,-527.939 v1(-267.589,-533.4)
  PWR w2: -291.719,-441.198 -282.18,-441.198 -278.417,-444.961 -278.417,-447.033 ; v3(-282.448,-453.136) -282.448,-451.064 -278.417,-447.033 ; J19.2@-270.34,-435.516 -271.197,-435.516 -272.39,-436.709 -272.39,-439.403 -272.058,-439.735 -272.058,-441.438 -272.937,-442.317 -273.701,-442.317 -278.417,-447.033 ; v1(-270.025,-466.494) -269.244,-466.494 -266.544,-463.794 -249.202,-463.794 -244.259,-458.851 v1(-242.362,-458.851)
  Bottom Layer w0.254: J21.2@-325.101,-458.97 -324.631,-458.97 -324.262,-459.338 -324.19,-459.338 -322.961,-460.568 v1(-322.961,-463.423) ; R76.2@-316.466,-461.321 -316.26,-461.527 v1(-313.944,-461.527) ; v1(-312.293,-476.758) -312.834,-476.217 R11.1@-312.834,-474.859 -312.647,-474.859 -311.309,-473.521 v1(-311.309,-472.615) ; IC2.2@-298.534,-440.875 -298.211,-440.552 -297.205,-440.552 -296.238,-439.585 C61.2@-294.958,-439.585 -294.916,-439.627 C17.2@-292.768,-439.627 -292.561,-439.834 R7.2@-291.013,-439.834 -291.013,-440.022 -292.19,-441.198 v1(-292.354,-441.198) ; C40.2@-273.398,-526.31 -273.304,-526.404 v1(-273.304,-527.939) ; Q9.8@-272.007,-533.196 -269.893,-533.196 R89.2@-269.823,-533.266 -267.723,-533.266 v1(-267.589,-533.4) ; R117.2@-242.815,-460.414 -239.682,-460.414 R121.2@-239.673,-460.406 ; R117.2@-242.748,-460.414 -242.362,-460.029 v1(-242.362,-458.851)
  Bottom Layer w2: v3(-282.448,-453.136) -281.583,-454.001 -279.781,-454.001 -278.677,-455.105 -277.78,-455.105 -277.43,-455.455 C11.2@-277.43,-455.53 ; C11.2@-277.35,-455.53 C10.2@-274.475,-455.53 -274.048,-455.53 -273.809,-455.291 -271.625,-455.291 -271.544,-455.372 -271.544,-459.468 -270.025,-460.987 R4.1@-270.025,-463.677 v1(-270.025,-466.494) ; v1(-242.362,-458.851) -239.059,-455.548 -238.028,-455.548 -235.765,-453.286 -235.765,-450.607 R118.2@-235.923,-450.449